# Altium PCB OFP_MCM_v1.5.PcbDoc (part 1 of 8)
Units mm, origin at the board's own origin, x right, y up, seen from the top; angles counter-clockwise.
Board outline 110 x 120 mm, 4 copper layers (Top Layer, Layer 1, Layer 2, Bottom Layer), stack 1.576 mm thick; 353 components, 268 nets, 1240 pads, 519 vias.
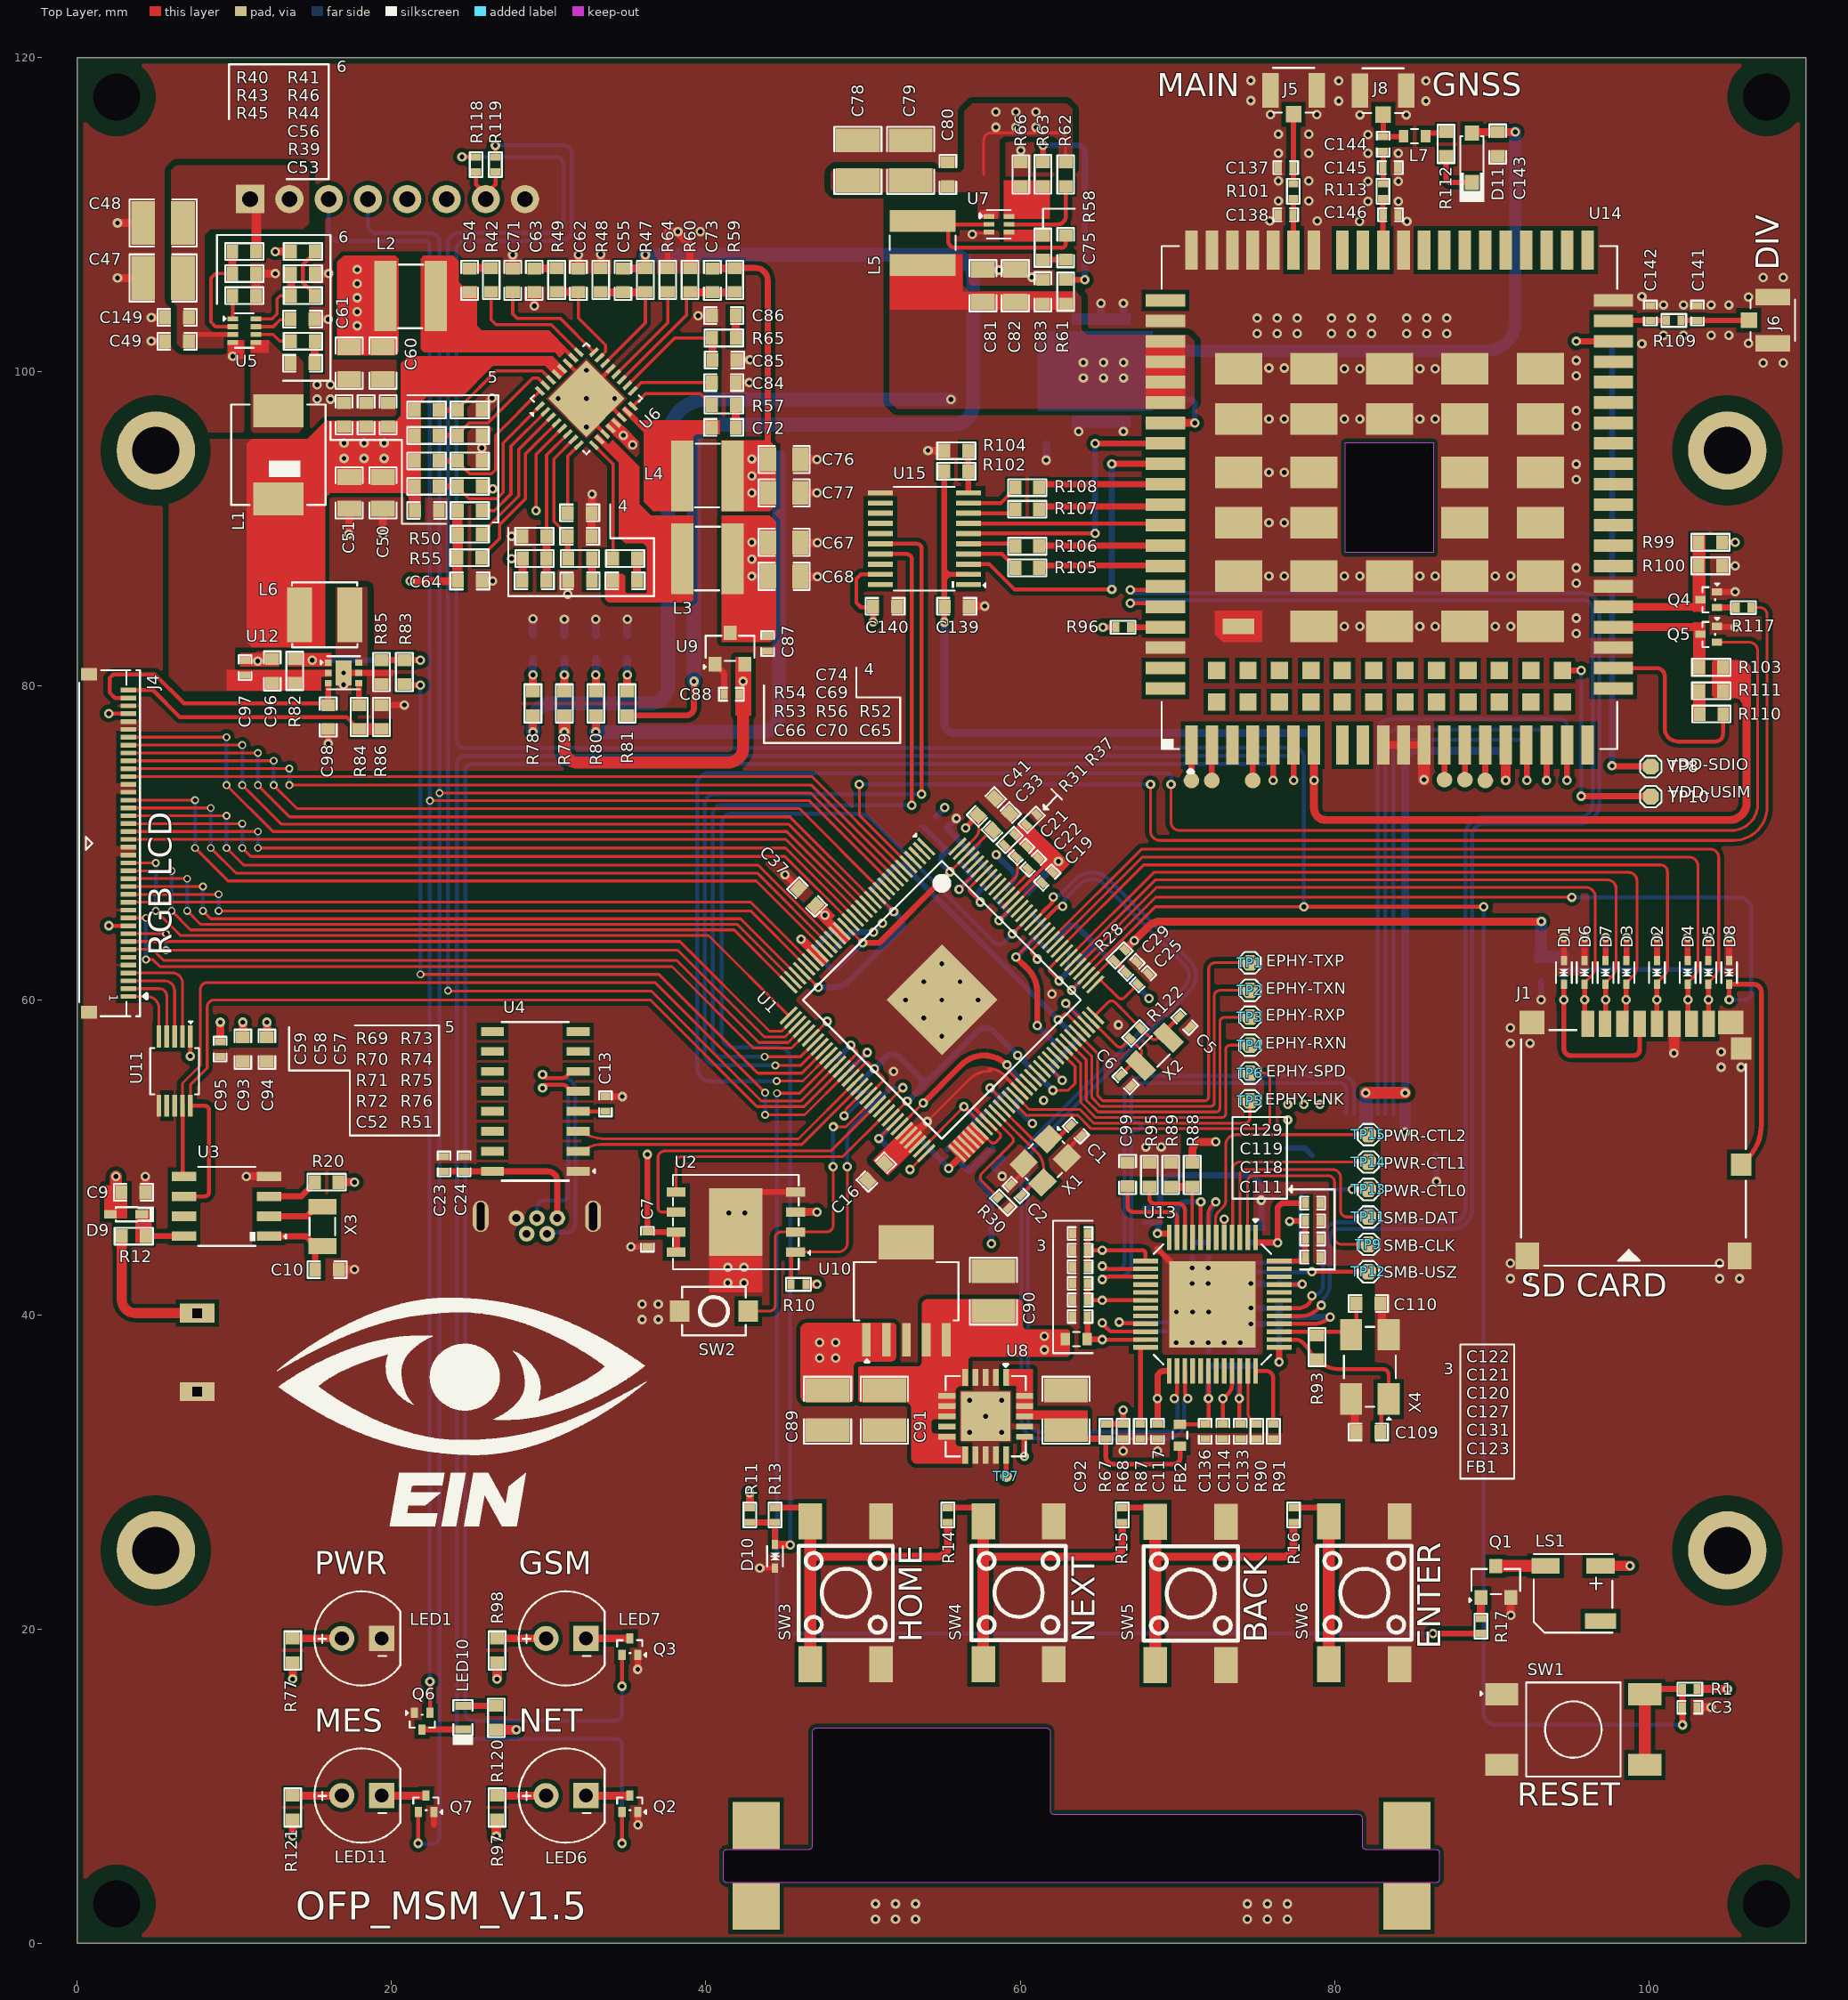
[diagram p0: Top Layer view]
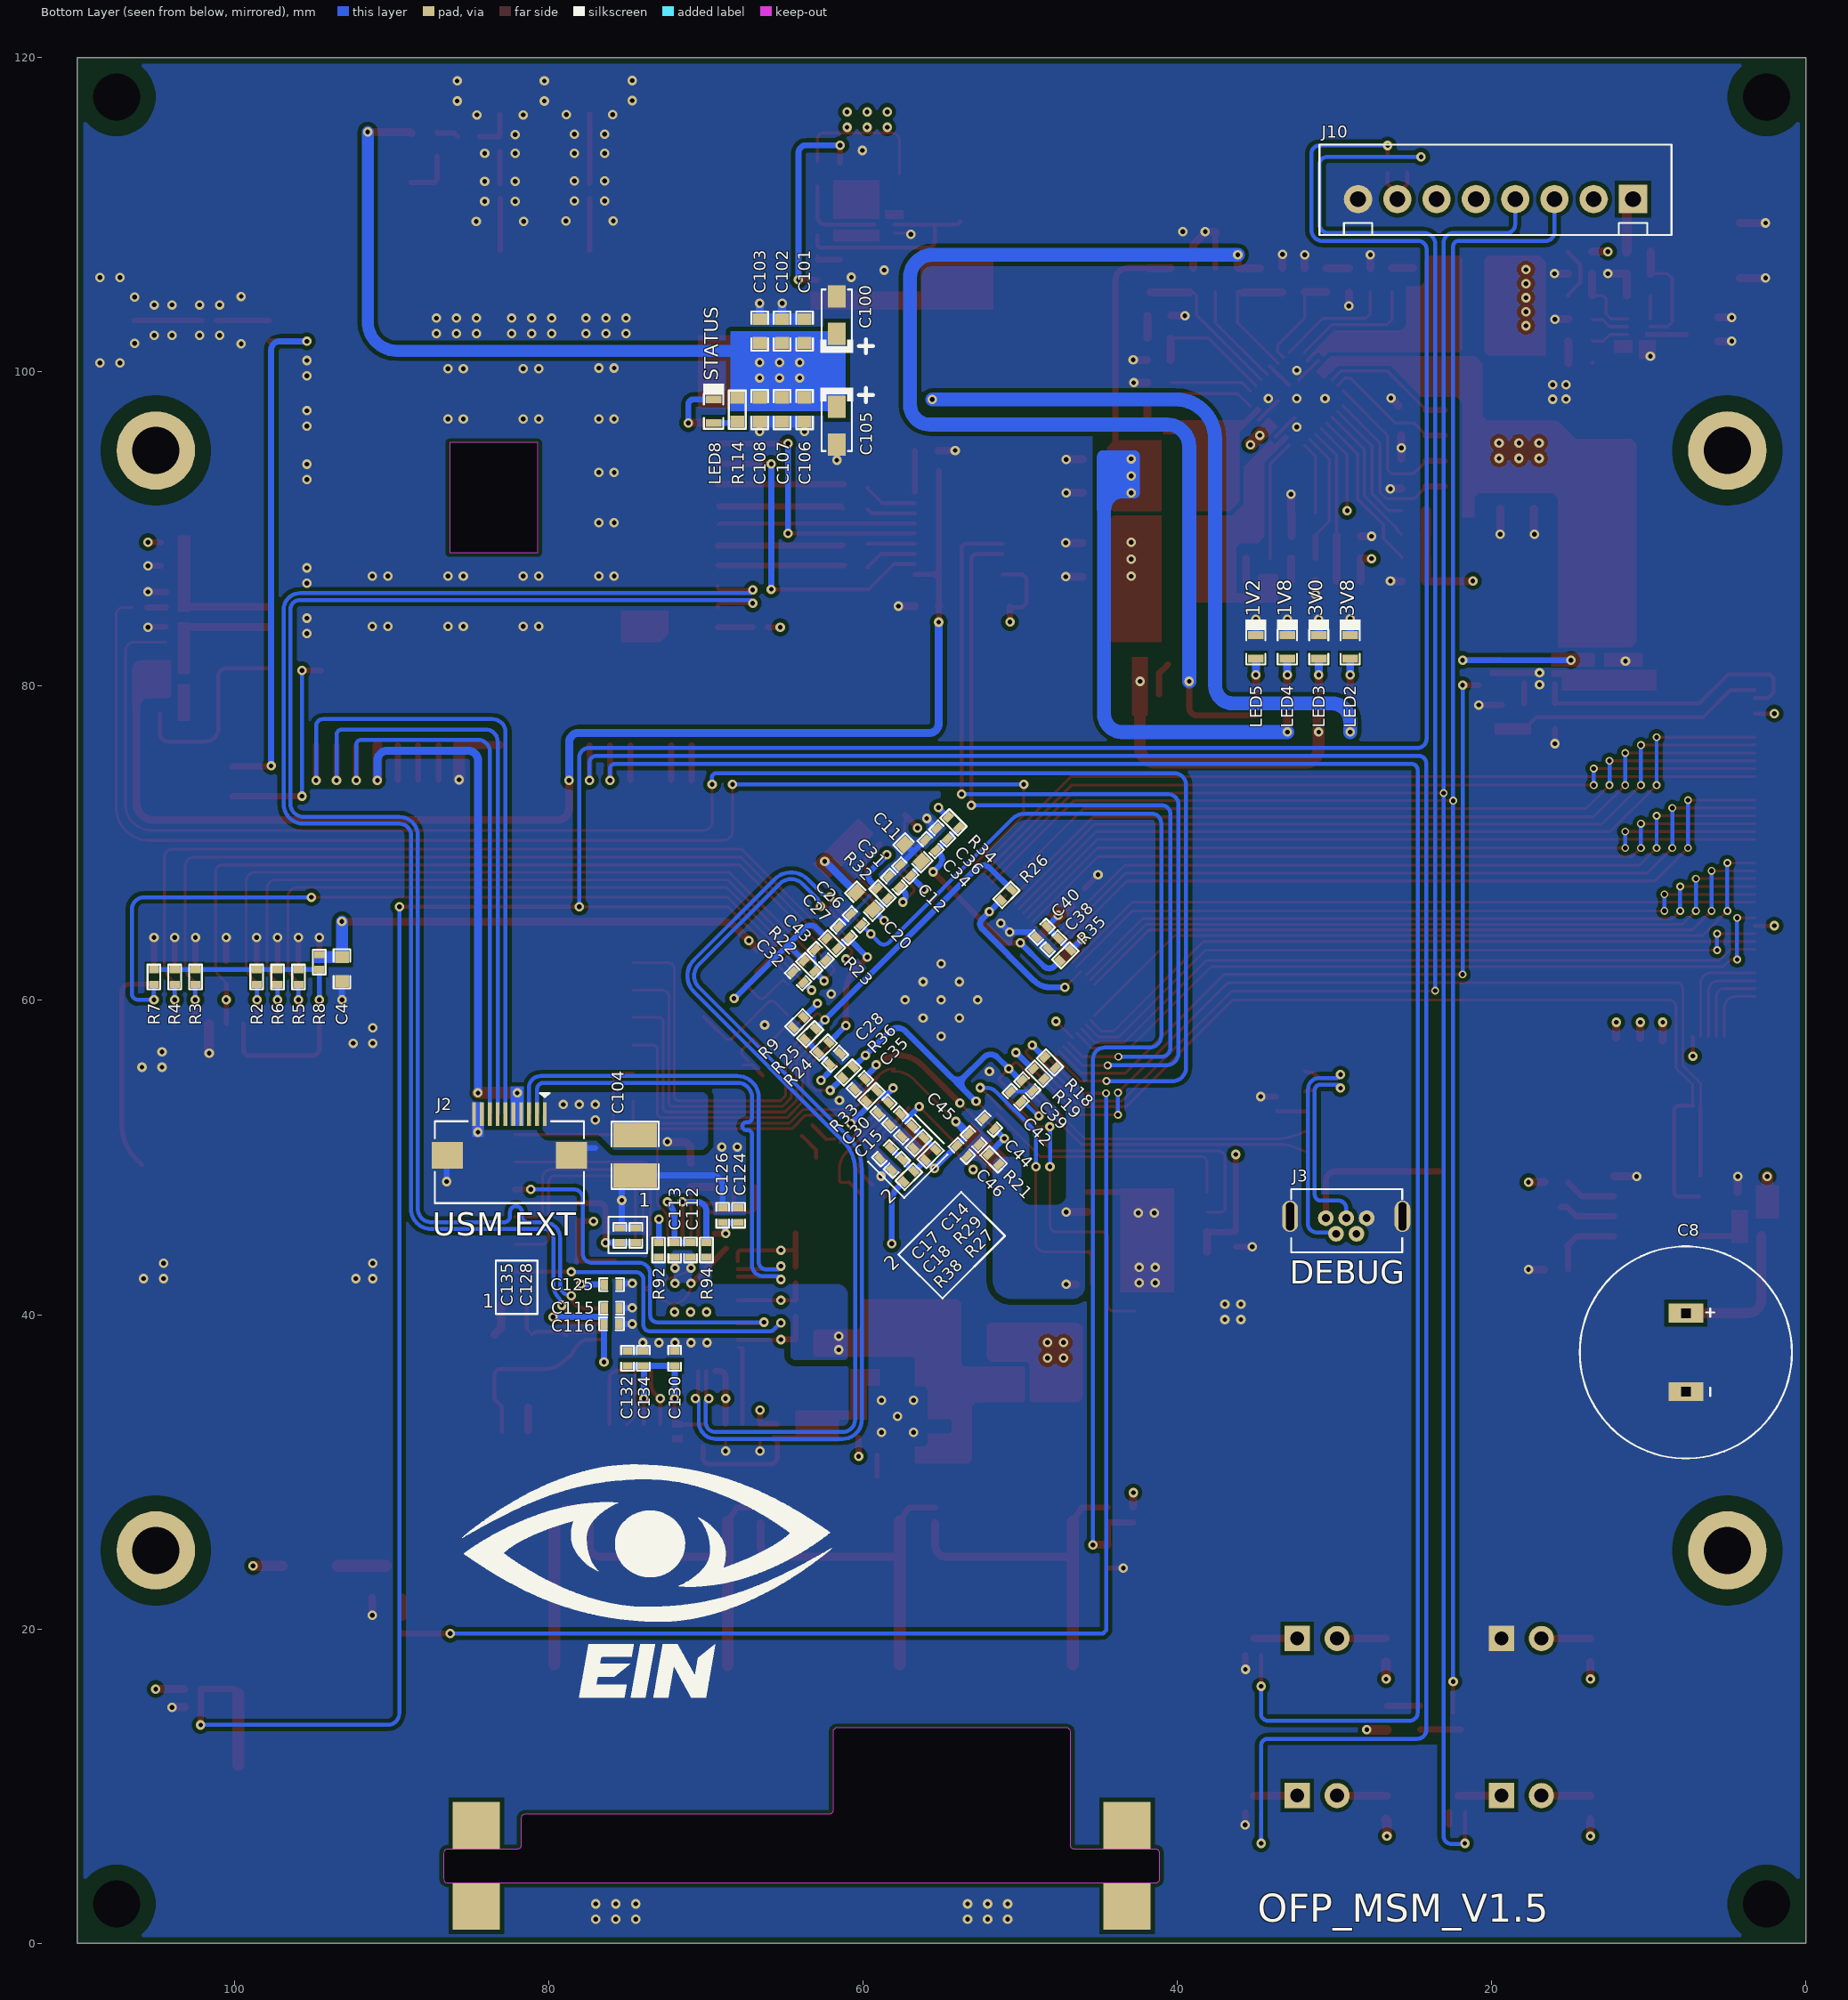
[diagram p1: Bottom Layer view, seen from below]
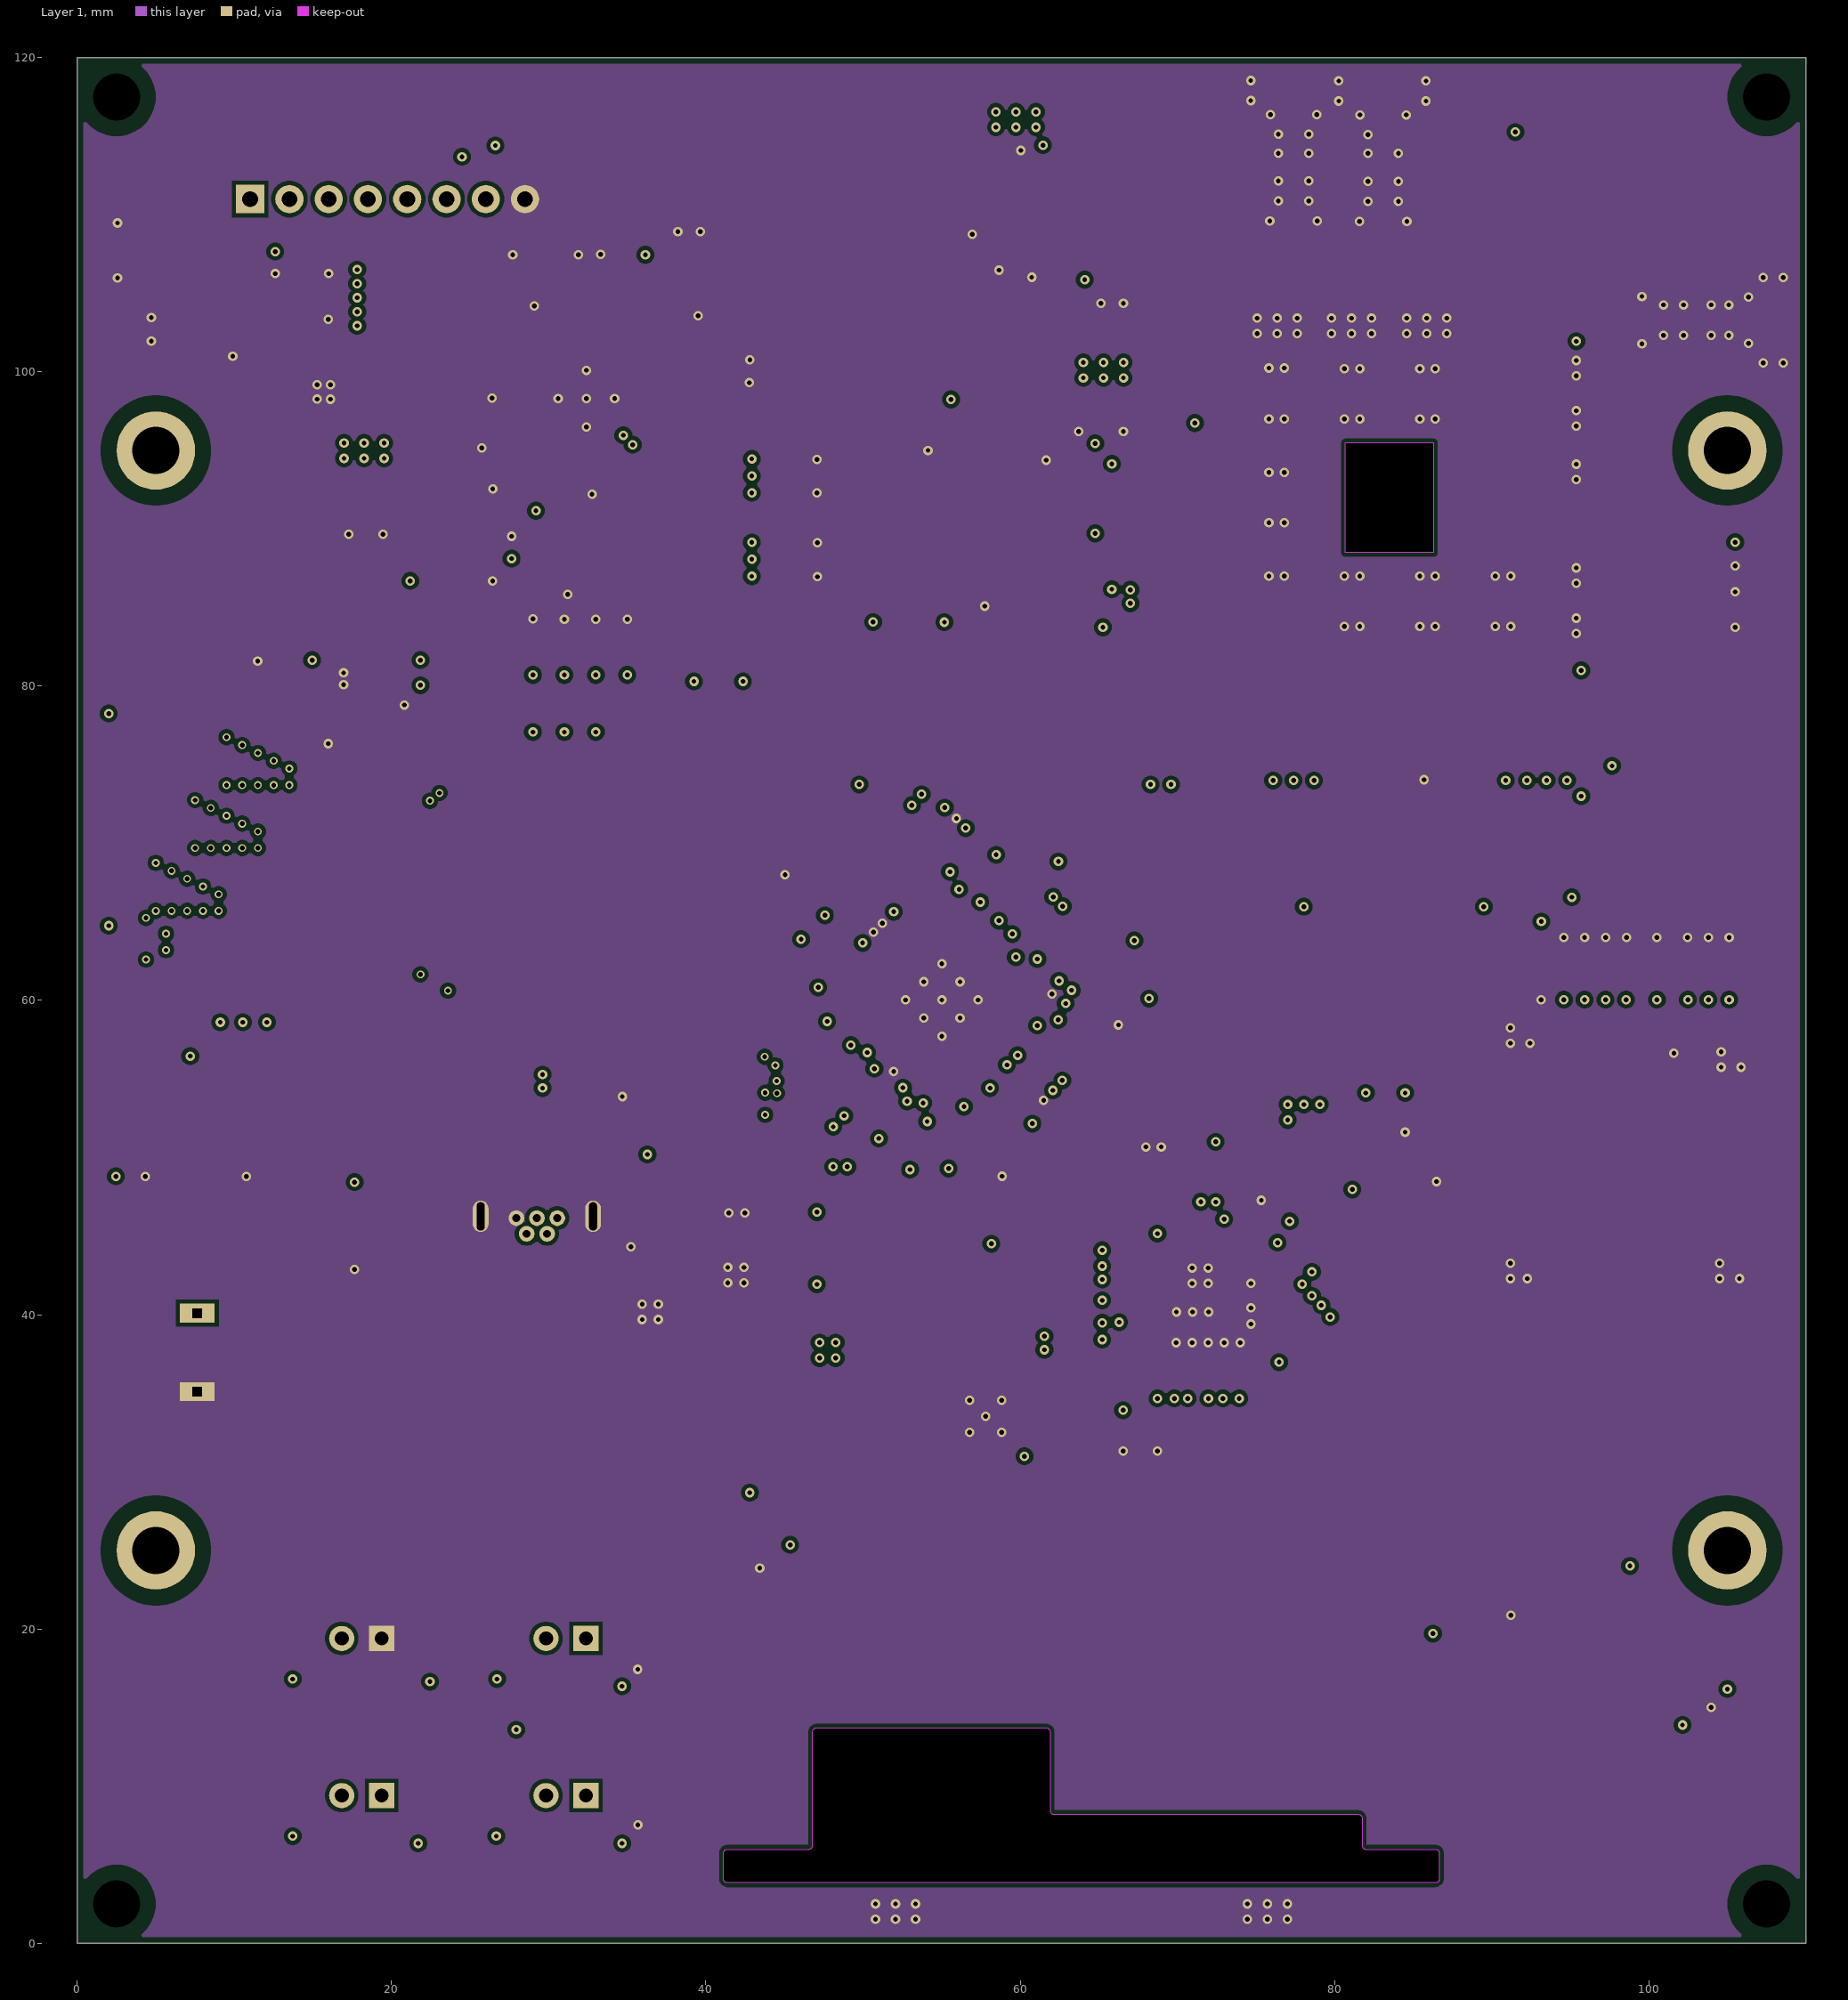
[diagram p2: Layer 1]
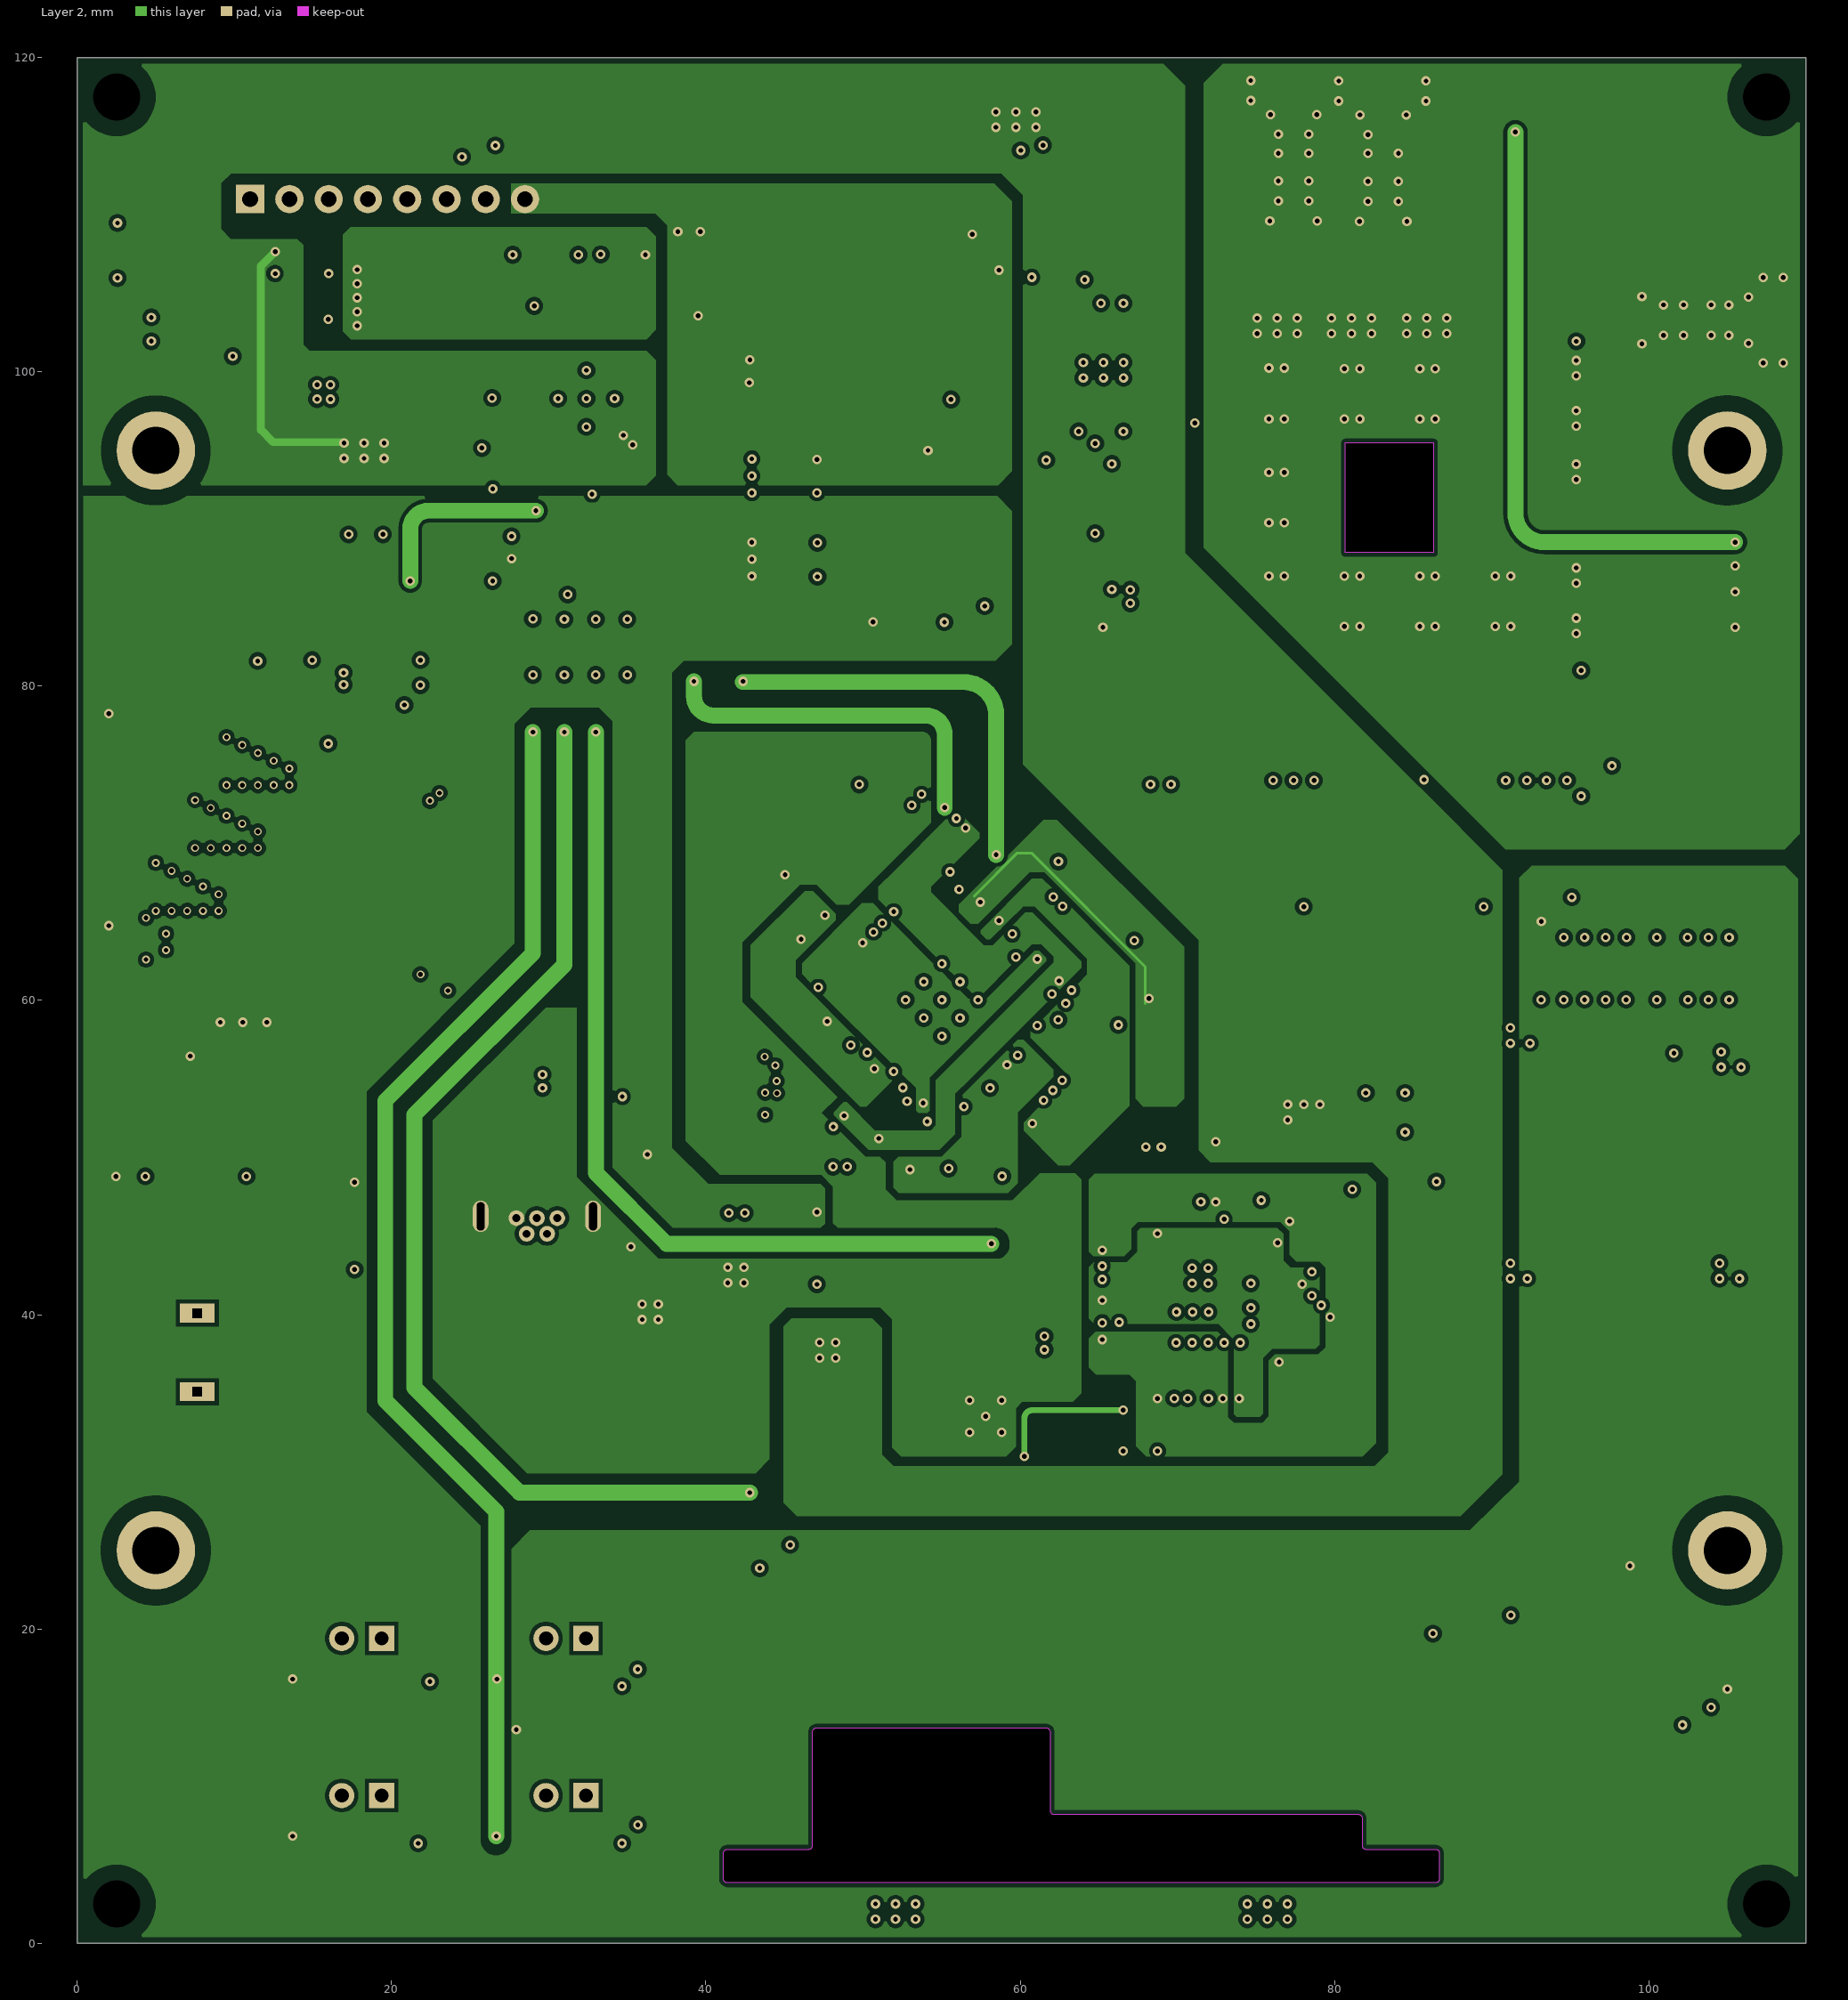
[diagram p3: Layer 2]
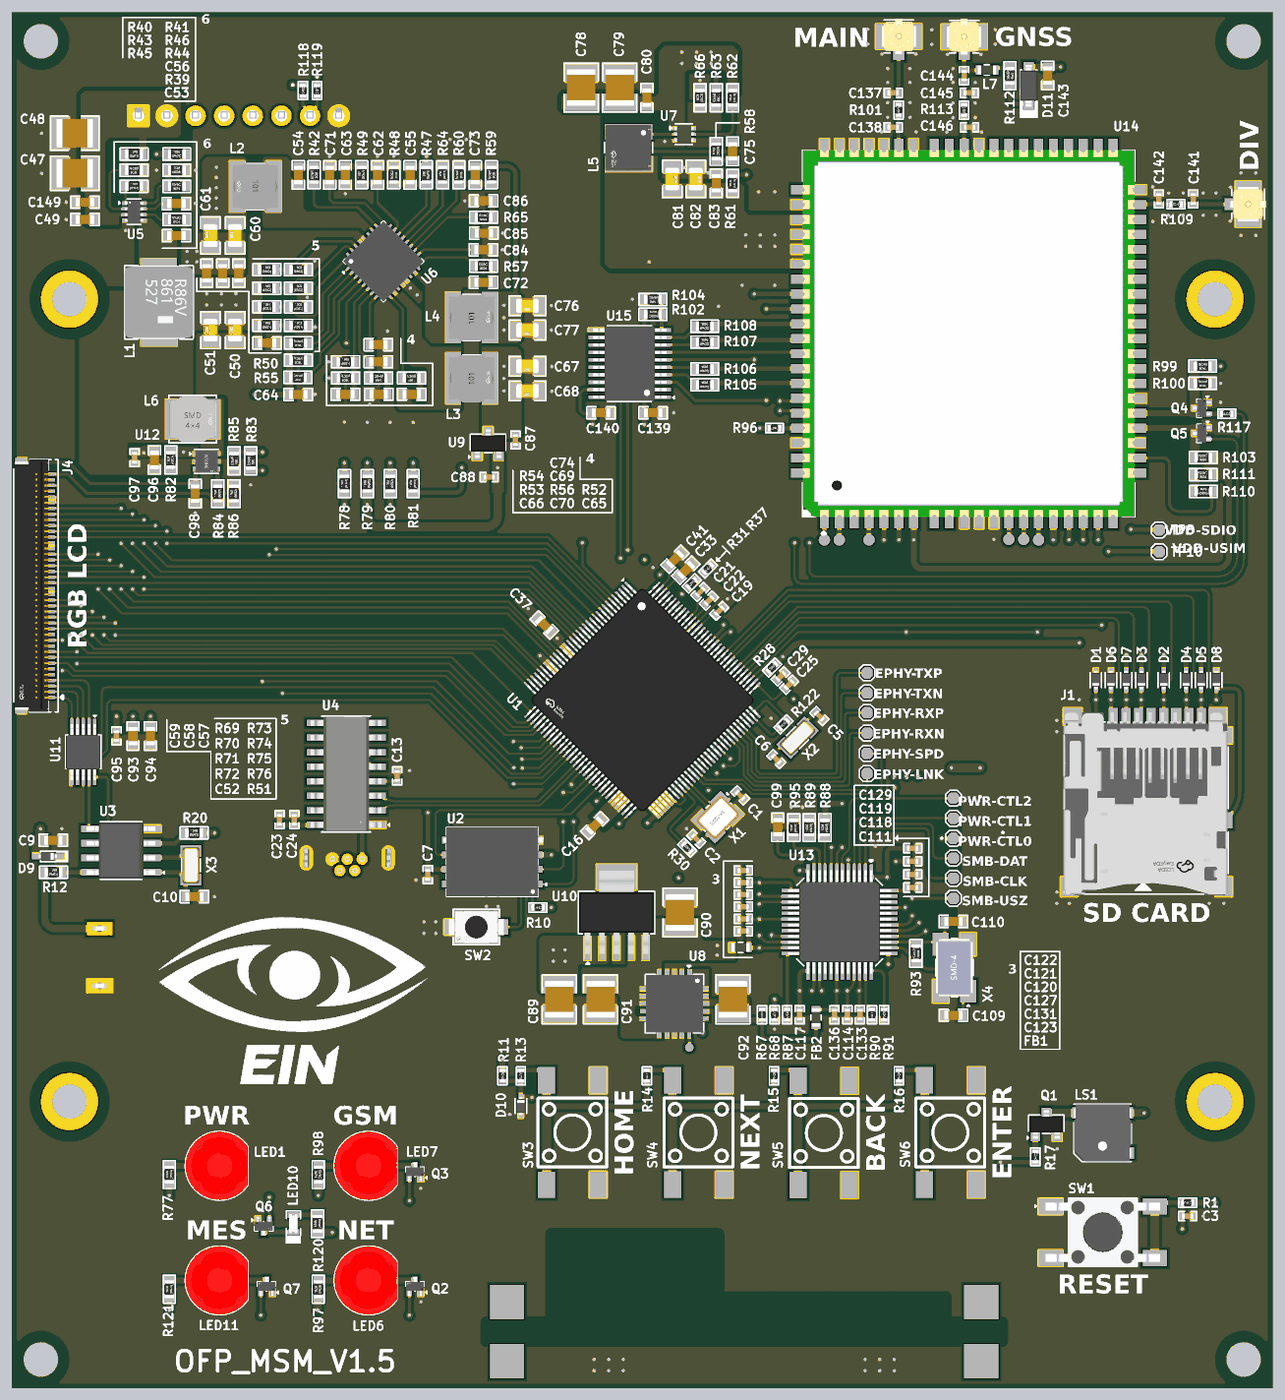
[diagram p7: 3D render of the assembled board from above, using the file's embedded part models]
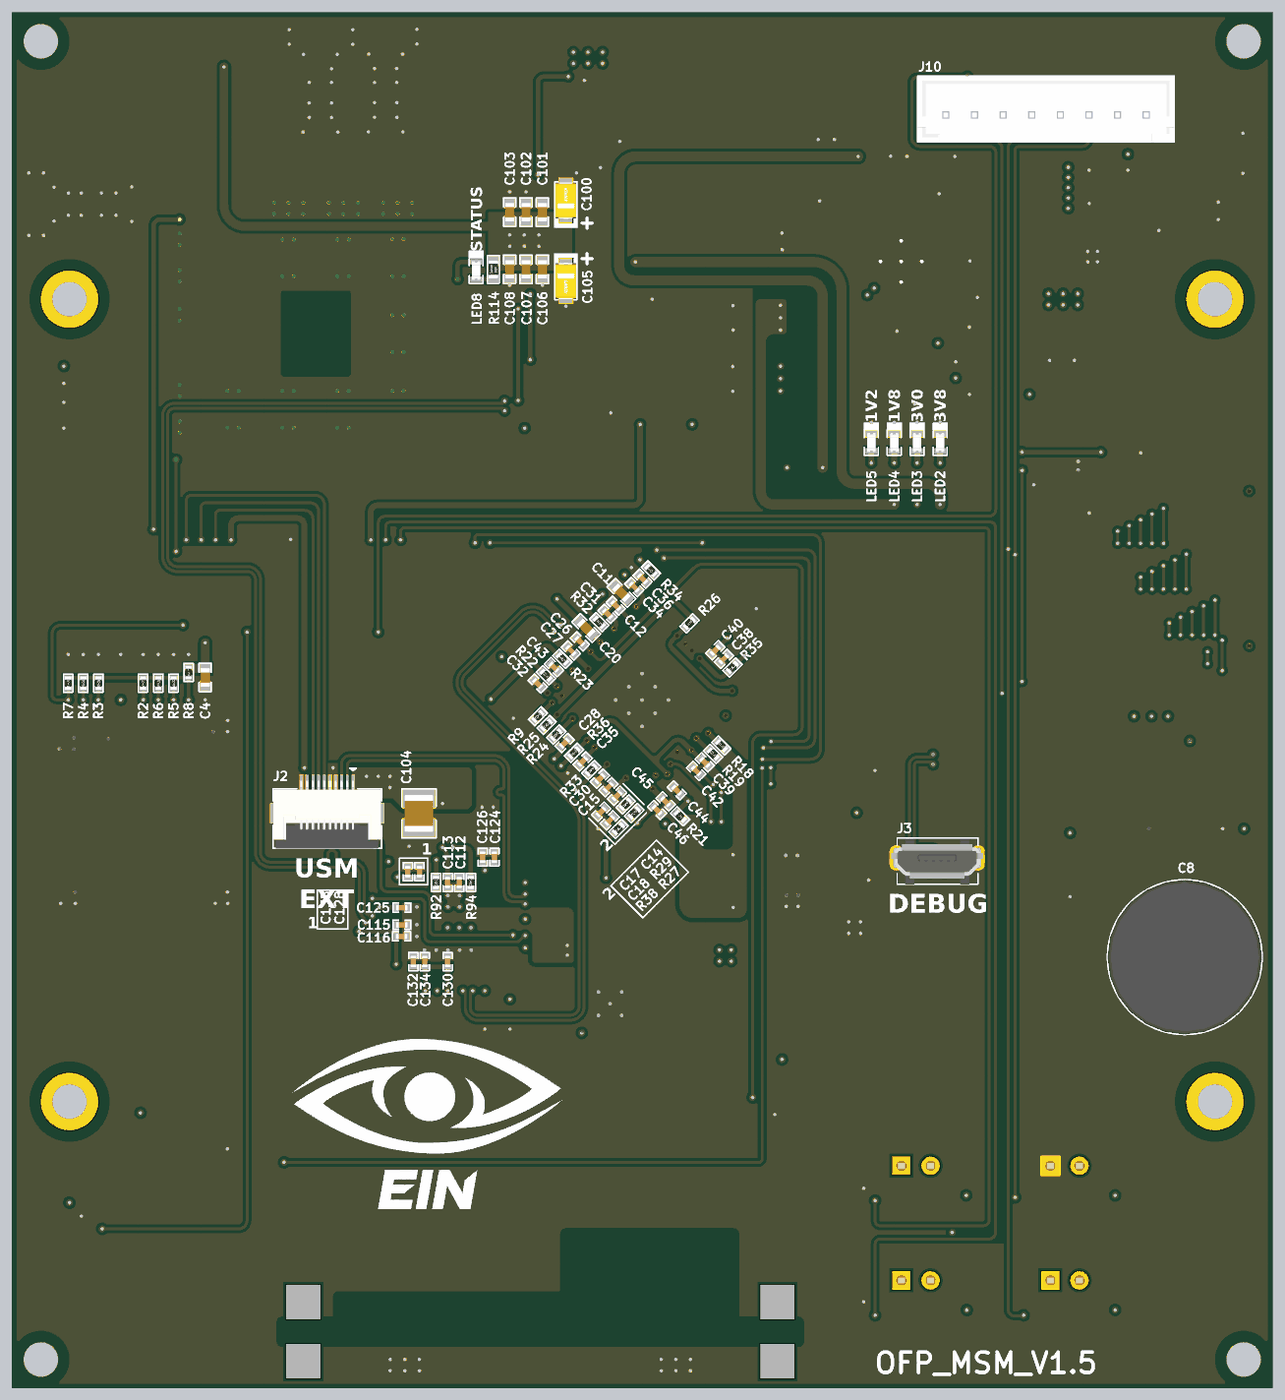
[diagram p8: 3D render of the assembled board from below, using the file's embedded part models]

## Layer stack, top to bottom
Top Solder: solder mask 0.0102, Solder Resist, Dk 3.5
Top Layer: signal copper 0.035
Dielectric 2: prepreg 0.203, PP-006, Dk 4.4
Layer 1: signal copper 0.035
Dielectric 1: dielectric 1.03, FR-4, Dk 4.6
Layer 2: signal copper 0.035
Dielectric 3: prepreg 0.203, PP-006, Dk 4.4
Bottom Layer: signal copper 0.035
Bottom Solder: solder mask 0.0102, Solder Resist, Dk 3.5

## Board outline
0,0 0,120 110,120 110,0
cut-out: 41.38,3.841 cw(c41.38,4.1) 41.121,4.1 41.121,5.73 cw(c41.38,5.73) 41.38,5.989 46.559,5.989 ccw(c46.559,6.221) 46.791,6.221 46.791,13.45 cw(c47.05,13.45) 47.05,13.709 61.65,13.709 cw(c61.65,13.45) 61.909,13.45 61.909,8.454 ccw(c62.154,8.454) 62.154,8.209 81.5,8.209 cw(c81.5,7.95) 81.759,7.95 81.759,6.218 ccw(c81.988,6.218) 81.988,5.989 86.42,5.989 cw(c86.42,5.73) 86.679,5.73 86.679,4.1 cw(c86.42,4.1) 86.42,3.841
cut-out: 80.7,88.5 80.7,95.5 86.3,95.5 86.3,88.5

## Design rules (kind name [scope] priority, off if disabled: settings)
BoardOutlineClearance [All] p1: gap=0 ignorepadtopadclearanceinfootprint=FALSE except(0.381: Poly-OutlineEdge)
Clearance [All] p1: gap=0.254 ignorepadtopadclearanceinfootprint=FALSE except(0.152: Arc-Via Track-Via SMDPad-SMDPad; 0.178: Arc-Arc Arc-Track Arc-SMDPad Arc-THPad Arc-Fill Arc-Region Track-Track Track-SMDPad Track-THPad Track-Fill Track-Region SMDPad-Via SMDPad-Fill SMDPad-Region THPad-THPad THPad-Region Via-Fill Via-Region Fill-Fill Fill-Region Region-Region; 0.381: Poly-Poly)
ComponentClearance [All] p1: gap=0 collisioncheckmode=3 verticalgap=0 showdistances=FALSE
DiffPairsRouting [InDifferentialPairClass('DIFF_USB')] p1: maxlimit=0.254 minlimit=0.178 mostfreqgap=0.254 toplayer_maxgap=0.178 toplayer_prefgap=0.178 toplayer_minwidth=0.254 toplayer_maxwidth=0.254 toplayer_prefwidth=0.254 midlayer1_mingap=0.254 midlayer1_minwidth=0.178 midlayer1_maxwidth=0.178 midlayer1_prefwidth=0.178 midlayer2_mingap=0.254 midlayer2_minwidth=0.178 midlayer2_maxwidth=0.178 midlayer2_prefwidth=0.178 bottomlayer_maxgap=0.178 bottomlayer_prefgap=0.178 bottomlayer_minwidth=0.254 bottomlayer_maxwidth=0.254 bottomlayer_prefwidth=0.254 impedanceprofiledriven=TRUE impedanceprofileid={ABD523BC-F643-4530-ABE1-0D8876D3E9E7} impedanceprofilevalue=90.000000 maxuncoupledlength=12.7
HoleSize [All] p1: absolutevalues=TRUE maxlimit=25.4 minlimit=0.025 maxpercent=80.000 minpercent=20.000
HoleToHoleClearance [All] p1: gap=0 allowstackedmicrovias=TRUE
MinimumSolderMaskSliver [All] p1: minsoldermaskwidth=0
PolygonConnect [All] p1: connectstyle=Direct reliefconductorwidth=0.254 reliefentries=4 polygonreliefangle="90 Angle" airgapwidth=0.254
RoutingVias [All] p1: holewidth=0.3 width=0.6 viastyle="Through Hole" minholewidth=0.2 minwidth=0.4 maxholewidth=0.7 maxwidth=1.2
ShortCircuit "ShortCircuit - No NET" [InNet('No Net')] p1: allowed=TRUE
SilkToSilkClearance [All] p1: silktosilkclearance=0
SilkToSolderMaskClearance [IsPad] p1: minsilkscreentomaskgap=0 clearancetoexposedcopper=TRUE
SolderMaskExpansion [All] p1: expansion=0.102 istentingtop=FALSE
SupplyNets "Schematic Supply Nets_51" [InNet('VCC-DRAM')] p1: voltage=0.000
SupplyNets "Schematic Supply Nets_50" [InNet('+EXT')] p2: voltage=0.000
SupplyNets "Schematic Supply Nets_49" [InNet('VCC-RTC')] p3: voltage=0.000
SupplyNets "Schematic Supply Nets_48" [InNet('VDD11')] p4: voltage=0.000
SupplyNets "Schematic Supply Nets_47" [InNet('VCC-USB')] p5: voltage=0.000
SupplyNets "Schematic Supply Nets_40" [InNet('+1.8V')] p6: voltage=0.000
SupplyNets "Schematic Supply Nets_39" [InNet('VRA1')] p7: voltage=0.000
SupplyNets "Schematic Supply Nets_38" [InNet('VLED+')] p8: voltage=0.000
SupplyNets "Schematic Supply Nets_37" [InNet('+5VUSB')] p9: voltage=0.000
SupplyNets "Schematic Supply Nets_36" [InNet('VDD33')] p10: voltage=0.000
SupplyNets "Schematic Supply Nets_35" [InNet('VLED-')] p11: voltage=0.000
SupplyNets "Schematic Supply Nets_34" [InNet('VCC-MCSI')] p12: voltage=0.000
SupplyNets "Schematic Supply Nets_32" [InNet('V7V')] p13: voltage=0.000
SupplyNets "Schematic Supply Nets_31" [InNet('AVCC')] p14: voltage=0.000
SupplyNets "Schematic Supply Nets_30" [InNet('3.3V-HUB')] p15: voltage=0.000
SupplyNets "Schematic Supply Nets_28" [InNet('VDD-SYS')] p16: voltage=0.000
SupplyNets "Schematic Supply Nets_27" [InNet('AGND')] p17: voltage=0.000
SupplyNets "Schematic Supply Nets_26" [InNet('RTC_VIO')] p18: voltage=0.000
SupplyNets "Schematic Supply Nets_25" [InNet('VSD')] p19: voltage=0.000
SupplyNets "Schematic Supply Nets_22" [InNet('VCC_PE')] p20: voltage=0.000
SupplyNets "Schematic Supply Nets_21" [InNet('+3.0V')] p21: voltage=0.000
SupplyNets "Schematic Supply Nets_20" [InNet('VDD-PHY')] p22: voltage=0.000
SupplyNets "Schematic Supply Nets_18" [InNet('+3.8V')] p23: voltage=0.000
SupplyNets "Schematic Supply Nets_17" [InNet('+USIM')] p24: voltage=0.000
SupplyNets "Schematic Supply Nets_16" [InNet('SVREF')] p25: voltage=0.000
SupplyNets "Schematic Supply Nets_15" [InNet('CH_3.3V')] p26: voltage=0.000
SupplyNets "Schematic Supply Nets_14" [InNet('VCC-HP')] p27: voltage=0.000
SupplyNets "Schematic Supply Nets_13" [InNet('V3S_RST')] p28: voltage=0.000
SupplyNets "Schematic Supply Nets_12" [InNet('HPVCCBP')] p29: voltage=0.000
SupplyNets "Schematic Supply Nets_11" [InNet('+1.2V')] p30: voltage=0.000
SupplyNets "Schematic Supply Nets_10" [InNet('VCC-PLL')] p31: voltage=0.000
SupplyNets "Schematic Supply Nets_9" [InNet('+3.3V')] p32: voltage=0.000
SupplyNets "Schematic Supply Nets_8" [InNet('VRA2')] p33: voltage=0.000
SupplyNets "Schematic Supply Nets_6" [InNet('1.1V-HUB')] p34: voltage=0.000
SupplyNets "Schematic Supply Nets_5" [InNet('VDD-CPU')] p35: voltage=0.000
SupplyNets "Schematic Supply Nets_3" [InNet('VCC-PHY')] p36: voltage=0.000
SupplyNets "Schematic Supply Nets_2" [InNet('KEYADC0')] p37: voltage=0.000
SupplyNets "Schematic Supply Nets" [InNet('VCC-IO')] p38: voltage=0.000
SupplyNets "Schematic Supply Nets_45" [InNet('GND')] p39: voltage=0.000
SupplyNets "Schematic Supply Nets_42" [InNet('+5V')] p40: voltage=0.000
SupplyNets "Schematic Supply Nets_41" [InNet('VIN+')] p41: voltage=0.000
Width [All] p1: maxlimit=2.54 minlimit=0.178 preferedwidth=0.381 minimp=50.000000 maximp=50.000000 favimp=50.000000
22 further rules are at their usual default settings.

## Classes and differential pairs
differential pair class DIFF_USB: CH_USB USB-D USB-GSM-D USB-PD-D
component class RGB-LCD-Sheet: C93 C94 C95 C96 C97 C98 J4 L6 R82 R83 R84 R85 R86 U11 U12
component class Others-Sheet: C149 J10 LED10 LED11 Q6 Q7 R117 R118 R119 R120 R121
component class Microprocessor-Sheet: C1 C2 C3 C4 C5 C6 C7 C8 C9 C10 C11 C12 C13 C14 C15 C16 C17 C18 C19 C20 C21 C22 C23 C24 C25 C26 C27 C28 C29 C30 C31 C32 C33 C34 C35 C36 C37 C38 C39 C40 C41 C42 C43 C44 C45 C46 D1 D2 D3 D4 D5 D6 D7 D8 D9 D10 J1 J2 J3 LS1 Q1 R1 R2 R3 R4 R5 R6 R7 R8 R9 R10 R11 R12 R13 R14 R15 R16 R17 R18 R19 R20 R21 R22 R23 R24 R25 R26 R27 R28 R29 R30 R31 R32 R33 R34 R35 R36 R37 R38 R122 SW1 SW2 SW3 SW4 SW5 SW6 TP1 TP2 TP3 TP4 TP5 TP6 U1 U2 U3 U4 X1 X2 X3
component class GSM-USB-HUB-Sheet: C99 C100 C101 C102 C103 C104 C105 C106 C107 C108 C109 C110 C111 C112 C113 C114 C115 C116 C117 C118 C119 C120 C121 C122 C123 C124 C125 C126 C127 C128 C129 C130 C131 C132 C133 C134 C135 C136 C137 C138 C139 C140 C141 C142 C143 C144 C145 C146 D11 FB1 FB2 J5 J6 J8 L7 LED6 LED7 LED8 Q2 Q3 Q4 Q5 R87 R88 R89 R90 R91 R92 R93 R94 R95 R96 R97 R98 R99 R100 R101 R102 R103 R104 R105 R106 R107 R108 R109 R110 R111 R112 R113 R114 TP8 TP9 TP10 TP11 TP12 TP13 TP14 TP15 U13 U14 U15 X4
component class Power-Sheet: C47 C48 C49 C50 C51 C52 C53 C54 C55 C56 C57 C58 C59 C60 C61 C62 C63 C64 C65 C66 C67 C68 C69 C70 C71 C72 C73 C74 C75 C76 C77 C78 C79 C80 C81 C82 C83 C84 C85 C86 C87 C88 C89 C90 C91 C92 L1 L2 L3 L4 L5 LED1 LED2 LED3 LED4 LED5 R39 R40 R41 R42 R43 R44 R45 R46 R47 R48 R49 R50 R51 R52 R53 R54 R55 R56 R57 R58 R59 R60 R61 R62 R63 R64 R65 R66 R67 R68 R69 R70 R71 R72 R73 R74 R75 R76 R77 R78 R79 R80 R81 TP7 U5 U6 U7 U8 U9 U10
differential pair CH_USB: +CH_USB_P -CH_USB_N
differential pair USB-PD-D: +USB-PD-D_P -USB-PD-D_N
differential pair USB-GSM-D: +USB-GSM-D_P -USB-GSM-D_N
differential pair USB-D: +USB-D_P -USB-D_N

## Components (designator, comment, footprint, x,y, rotation, side; value= is the part's Value field where it differs from the comment)
C1 "15pF" Cap-0402 63.55,51.72 r135 top
C2 "15pF" Cap-0402 59.718,47.926 r315 top
C3 "1uF" Cap-0402 102.616,15.015 r180 top
C4 "10uF" Cap-0603 93.157,62.007 r90 bottom
C5 "15pF" Cap-0402 70.461,58.638 r135 top
C6 "15pF" Cap-0402 66.708,54.889 r135 top
C7 "0.1uF" Cap-0402 36.279,44.795 r90 top value=100nF
C8 "0.47F" "SC EB 5R5 474 M" 7.64,37.6 r270 bottom
C9 "0.1uF" Cap-0603 3.575,47.793 r180 top value=100nF
C10 "12pF" Cap-0603 15.9,42.875 r180 top
C11 "10uF" Cap-0603 56.817,69.392 r225 bottom
C12 "0.1uF" Cap-0402 57.311,68.263 r225 bottom value=100nF
C13 "0.1uF" Cap-0402 33.608,53.414 r270 top value=100nF
C14 "0.1uF" Cap-0402 57.2,51.675 r135 bottom value=100nF
C15 "0.1uF" Cap-0402 57.951,52.425 r135 bottom value=100nF
C16 "10uF" Cap-0603 50.848,49.073 r45 top
C17 "1uF" Cap-0402 58.59,50.281 r135 bottom
C18 "0.1uF" Cap-0402 57.835,49.537 r135 bottom value=100nF
C19 "0.1uF" Cap-0402 61.728,67.827 r225 top value=100nF
C20 "10uF" Cap-0603 59.891,66.318 r225 bottom
C21 "4.7uF" Cap-0402 60.083,69.469 r225 top
C22 "1uF" Cap-0402 60.829,68.712 r225 top
C23 "1uF" Cap-0402 23.341,49.594 r270 top
C24 "0.1uF" Cap-0402 24.621,49.594 r270 top value=100nF
C25 "4.7uF" Cap-0402 67.824,61.365 r225 top
C26 "1nF" Cap-0402 60.452,65.148 r225 bottom
C27 "0.1uF" Cap-0402 61.224,64.351 r225 bottom value=100nF
C28 "0.1uF" Cap-0402 61.779,56.279 r315 bottom value=100nF
C29 "0.1uF" Cap-0402 67.086,62.109 r225 top value=100nF
C30 "0.1uF" Cap-0402 58.695,53.17 r135 bottom value=100nF
C31 "0.1uF" Cap-0402 58.024,67.551 r225 bottom value=100nF
C32 "10nF" Cap-0402 64.125,61.475 r225 bottom
C33 "10uF" Cap-0603 58.805,71.367 r225 top
C34 "1uF" Cap-0402 55.688,69.886 r225 bottom
C35 "0.1uF" Cap-0402 60.197,54.671 r135 bottom value=100nF
C36 "0.1uF" Cap-0402 54.963,70.612 r225 bottom value=100nF
C37 "10uF" Cap-0603 46.437,66.584 r315 top
C38 "1uF" Cap-0402 47.876,63.621 r135 bottom
C39 "0.1uF" Cap-0402 49.541,54.578 r45 bottom value=100nF
C40 "0.1uF" Cap-0402 48.627,64.371 r135 bottom value=100nF
C41 "10uF" Cap-0603 57.853,72.319 r225 top
C42 "1uF" Cap-0402 50.29,53.854 r225 bottom
C43 "0.1uF" Cap-0402 62.7,62.9 r45 bottom value=100nF
C44 "0.1uF" Cap-0402 51.975,52.152 r225 bottom value=100nF
C45 "1uF" Cap-0402 52.951,51.175 r45 bottom
C46 "0.1uF" Cap-0402 53.702,50.424 r45 bottom value=100nF
C47 "10uF" Cap-1210 5.464,105.978 r0 top
C48 "10uF" Cap-1210 5.464,109.478 r0 top
C49 "0.1uF" Cap-0603 6.353,101.952 r0 top value=100nF
C50 "22uF" Cap-0805 19.451,92.3 r90 top
C51 "22uF" Cap-0805 17.308,92.3 r90 top
C52 "0.1uF" Cap-0603 22.251,91.175 r180 top value=100nF
C53 "0.1uF" Cap-0603 14.338,100.552 r180 top value=100nF
C54 "47nF" Cap-0603 24.976,105.825 r270 top
C55 "82pF" Cap-0603 34.732,105.825 r270 top
C56 "33nF" Cap-0603 14.338,103.352 r180 top
C57 "10uF" Cap-0603 19.781,97.271 r270 top
C58 "10uF" Cap-0603 18.381,97.271 r270 top
C59 "0.1uF" Cap-0603 16.978,97.271 r270 top value=100nF
C60 "22uF" Cap-0805 19.453,100.557 r90 top
C61 "22uF" Cap-0805 17.305,100.557 r90 top
C62 "22pF" Cap-0603 31.891,105.825 r90 top
C63 "3.3nF" Cap-0603 29.083,105.825 r270 top
C64 "1uF" Cap-0603 24.978,86.692 r180 top
C65 "47nF" Cap-0603 34.865,86.705 r180 top
C66 "22pF" Cap-0603 29.092,86.705 r0 top
C67 "22uF" Cap-0805 44.983,89.154 r180 top
C68 "22uF" Cap-0805 44.983,86.995 r180 top
C69 "22pF" Cap-0603 31.975,89.541 r0 top
C70 "2.2nF" Cap-0603 31.992,86.705 r180 top
C71 "0.01uF" Cap-0603 27.714,105.825 r270 top
C72 "47nF" Cap-0603 41.146,96.473 r180 top
C73 "22pF" Cap-0603 40.416,105.825 r270 top
C74 "0.01uF" Cap-0603 31.975,91.034 r180 top
C75 "0.1uF" Cap-0603 62.897,107.902 r90 top value=100nF
C76 "22uF" Cap-0805 44.983,94.431 r180 top
C77 "22uF" Cap-0805 44.983,92.304 r180 top
C78 "10uF" Cap-1210 49.675,113.46 r270 top
C79 "10uF" Cap-1210 53.029,113.46 r270 top
C80 "0.1uF" Cap-0603 55.402,112.571 r270 top value=100nF
C81 "22uF" Cap-0805 57.629,105.487 r270 top
C82 "22uF" Cap-0805 59.683,105.487 r270 top
C83 "0.1uF" Cap-0603 61.456,105.106 r270 top value=100nF
C84 "0.01uF" Cap-0603 41.146,99.315 r180 top
C85 "22pF" Cap-0603 41.177,100.766 r0 top
C86 "2.2nF" Cap-0603 41.146,103.577 r180 top
C87 "1uF" Cap-0402 43.932,82.711 r90 top
C88 "1uF" Cap-0402 41.632,79.484 r0 top
C89 "10uF" Cap-1210 47.752,33.924 r90 top
C90 "10uF" Cap-1210 58.304,41.504 r270 top
C91 "10uF" Cap-1210 51.359,33.924 r90 top
C92 "10uF" Cap-1210 62.916,33.924 r270 top
C93 "10uF" Cap-0603 10.541,56.896 r90 top
C94 "10uF" Cap-0603 12.068,56.896 r90 top
C95 "0.1uF" Cap-0402 9.1,56.9 r90 top value=100nF
C96 "2.2uF" Cap-0603 12.411,80.976 r270 top
C97 "0.1uF" Cap-0402 10.683,81.175 r270 top value=100nF
C98 "1uF" Cap-0603 15.975,78.039 r90 top
C99 "1uF" Cap-0603 66.84,48.926 r270 top
C100 "100uF" Case-A 61.664,103.616 r90 bottom
C101 "0.1uF" Cap-0603 63.719,102.6 r270 bottom value=100nF
C102 "33pF" Cap-0603 65.146,102.6 r270 bottom
C103 "10pF" Cap-0603 66.573,102.6 r270 bottom
C104 "10uF" Cap-1210 74.498,50.142 r90 bottom
C105 "100uF" Case-A 61.664,96.584 r270 bottom
C106 "0.1uF" Cap-0603 63.719,97.6 r90 bottom value=100nF
C107 "33pF" Cap-0603 65.146,97.6 r90 bottom
C108 "10pF" Cap-0603 66.573,97.6 r90 bottom
C109 "30pF" Cap-0603 82.167,32.532 r0 top
C110 "30pF" Cap-0603 82.167,40.711 r180 top
C111 "0.1uF" Cap-0402 78.613,43.671 r180 top value=100nF
C112 "10nF" Cap-0402 70.975,44.117 r90 bottom
C113 "1nF" Cap-0402 71.989,44.117 r90 bottom
C114 "0.1uF" Cap-0402 72.904,32.578 r90 top value=100nF
C115 "10nF" Cap-0402 75.987,40.417 r0 bottom
C116 "1nF" Cap-0402 76.007,39.417 r0 bottom
C117 "0.1uF" Cap-0402 68.746,32.578 r90 top value=100nF
C118 "10nF" Cap-0402 78.613,44.821 r180 top
C119 "1nF" Cap-0402 78.613,45.967 r180 top
C120 "0.1uF" Cap-0402 63.819,43.05 r0 top value=100nF
C121 "10nF" Cap-0402 63.819,44.106 r0 top
C122 "1nF" Cap-0402 63.819,45.162 r0 top
C123 "1uF" Cap-0402 63.819,39.882 r0 top
C124 "0.1uF" Cap-0402 67.912,46.328 r270 bottom value=100nF
C125 "10nF" Cap-0402 75.987,41.917 r0 bottom
C126 "1nF" Cap-0402 68.926,46.328 r270 bottom
C127 "0.1uF" Cap-0402 63.819,41.994 r0 top value=100nF
C128 "10nF" Cap-0402 74.451,45.056 r270 bottom
C129 "1nF" Cap-0402 78.613,47.101 r180 top
C130 "0.1uF" Cap-0402 71.982,37.217 r270 bottom value=100nF
C131 "10nF" Cap-0402 63.819,40.938 r0 top
C132 "1nF" Cap-0402 74.982,37.217 r270 bottom
C133 "0.1uF" Cap-0402 74.005,32.578 r90 top value=100nF
C134 "10nF" Cap-0402 73.982,37.217 r270 bottom
C135 "1nF" Cap-0402 75.465,45.056 r270 bottom
C136 "10uF" Cap-0402 71.779,32.578 r90 top
C137 "DNP" Cap-0402 76.9,113 r0 top
C138 "DNP" Cap-0402 76.9,110 r0 top
C139 "0.1uF" Cap-0603 55.959,85.084 r180 top value=100nF
C140 "0.1uF" Cap-0603 51.41,85.084 r180 top value=100nF
C141 "DNP" Cap-0402 103.096,103.749 r270 top
C142 "DNP" Cap-0402 100.104,103.749 r270 top
C143 "DNP" Cap-0603 90.399,114.503 r90 top value=100nF
C144 "DNP" Cap-0402 83.1,114.5 r90 top
C145 "DNP" Cap-0402 83.549,113 r180 top
C146 "DNP" Cap-0402 83.575,109.996 r180 top
C149 "10uF" Cap-0603 6.353,103.464 r0 top
D1 "ESD5Z3.3C" "SOD-523 (Bi-Directional)" 94.598,61.774 r270 top
D2 "ESD5Z3.3C" "SOD-523 (Bi-Directional)" 100.522,61.774 r270 top
D3 "ESD5Z3.3C" "SOD-523 (Bi-Directional)" 98.582,61.774 r270 top
D4 "ESD5Z3.3C" "SOD-523 (Bi-Directional)" 102.476,61.774 r270 top
D5 "ESD5Z3.3C" "SOD-523 (Bi-Directional)" 103.796,61.774 r270 top
D6 "ESD5Z3.3C" "SOD-523 (Bi-Directional)" 95.917,61.774 r270 top
D7 "ESD5Z3.3C" "SOD-523 (Bi-Directional)" 97.25,61.774 r270 top
D8 "ESD5Z3.3C" "SOD-523 (Bi-Directional)" 105.117,61.774 r270 top
D9 "1N4148WT" SOD-523F 3.105,46.393 r0 top
D10 "ESD5Z3.3C" "SOD-523 (Bi-Directional)" 44.4,24.62 r90 top
D11 "DNP" SOD-123 88.74,113.631 r270 top
FB1 "BLM18PG221SN1D" "IND-0603 (1608 Metric)" 63.568,38.45 r0 top value=100mR
FB2 "BLM18PG221SN1D" "IND-0603 (1608 Metric)" 70.172,32.327 r90 top value=100mR
J1 "5027740891" 5027740891 99.075,51.17 r0 top locked
J2 "HX0.5-10P XJH2.0 043" "HX0.5-10P XJH2.0 043" 82.499,51.458 r180 bottom locked
J3 "U-D-M5DD-Y-3" U-D-M5DD-Y-3 29.248,45.704 r180 bottom
J4 "FH34SRJ-40S-0.5SH(50)" FH34SRJ-40S-0.5SH(50) 2,70 r270 top locked
J5 "U.FL-R-SMT(10)" U.FL-R-SMT(10) 77.4,117.163 r90 top
J6 "U.FL-R-SMT(10)" U.FL-R-SMT(10) 107.129,103.292 r0 top
J8 "DNP" U.FL-R-SMT(10) 83.1,117.138 r90 top
J10 "B8B-XH-A(LF)(SN)" B8B-XH-A(LF)(SN) 19.75,111 r0 bottom locked
L1 "6.8uH" ETQP3M6R8KVN 12.8,94.73 r270 top value=45.6mR
L2 "4.7uH" SMNR4030-4R7MT 21.218,104.833 r180 top
L3 "4.7uH" SMNR4030-4R7MT 40.1,88.104 r0 top
L4 "4.7uH" SMNR4030-4R7MT 40.1,93.384 r0 top
L5 "4.7uH" SRN4018-4R7M 53.799,108.206 r270 top
L6 "22uH" YNR4018-220M 15.75,84.541 r0 top
L7 "DNP" "IND-0603 (1608 Metric)" 85.1,115 r180 top value=47nH
LED1 "RED" "TH LED 5mm_" 18.1,19.4 r180 top
LED2 "RED" LED-0603 29,82.5 r90 bottom
LED3 "RED" LED-0603 31,82.5 r90 bottom
LED4 "RED" LED-0603 33,82.5 r90 bottom
LED5 "RED" LED-0603 35,82.5 r90 bottom
LED6 "GREEN" "TH LED 5mm Green" 31.1,9.4 r180 top
LED7 "YELLOW" "TH LED 5mm Yellow" 31.1,19.4 r180 top
LED8 "RED" LED-0603 69.507,97.498 r90 bottom
LED10 "Yellow" LED-0603 24.546,14.361 r270 top
LED11 "GREEN" "TH LED 5mm Green" 18.1,9.4 r180 top
LS1 "FUET-5025" FUET-5025 95.182,22.265 r180 top
Q1 "MMBT2222A-7-F" SOT-23 90.272,23.006 r0 top
Q2 "DTC143ZETL" SOT-416 35.166,8.875 r0 top
Q3 "DTC143ZETL" SOT-416 35.166,18.875 r0 top
Q4 "DTC143ZETL" SOT-416 103.824,85.503 r90 top
Q5 "DTC143ZETL" SOT-416 103.824,83.303 r90 top
Q6 "DTC143ZETL" SOT-416 21.946,14.133 r180 top
Q7 "DTC143ZETL" SOT-416 22.2,8.875 r0 top
R1 "47K" Res-0402 102.616,16.18 r0 top
R2 "47K" Res-0402 98.582,61.499 r90 bottom
R3 "47K" Res-0402 102.477,61.499 r90 bottom
R4 "47K" Res-0402 103.797,61.499 r90 bottom
R5 "47K" Res-0402 95.917,61.499 r90 bottom
R6 "47K" Res-0402 97.25,61.499 r90 bottom
R7 "47K" Res-0402 105.118,61.499 r90 bottom
R8 "3.3R" Res-0402 94.598,62.439 r90 bottom
R9 "5.6K" Res-0402 64.108,58.608 r315 bottom value=5.6kR
R10 "10K" Res-0402 45.896,41.935 r0 top
R11 "11K" Res-0402 42.8,27.253 r90 top value=11kR
R12 "120R" Res-0603 3.6,45 r180 top
R13 "6.8K" Res-0402 44.4,27.253 r90 top value=6.8kR
R14 "8.2K" Res-0402 55.4,27.253 r90 top value=8.2kR
R15 "10K" Res-0402 66.5,27.253 r90 top
R16 "100K" Res-0402 77.4,27.253 r90 top
R17 "1K" Res-0402 89.322,20.192 r90 top
R18 "4.7K" Res-0402 48.094,56.051 r45 bottom
R19 "4.7K" Res-0402 48.817,55.327 r45 bottom
R20 "5.1K" Res-0603 15.875,48.438 r180 top
R21 "0R" Res-0402 51.687,49.888 r45 bottom
R22 "0R" Res-0402 63.413,62.192 r45 bottom
R23 "0R" Res-0402 61.975,63.625 r225 bottom
R24 "0R" Res-0402 62.505,57.005 r315 bottom
R25 "0R" Res-0402 63.357,57.857 r135 bottom
R26 "0R" Res-0402 50.876,66.721 r315 bottom
R27 "2K" Res-0402 55.698,50.173 r315 bottom value=2kR
R28 "0R" Res-0402 66.33,62.87 r225 top
R29 "2K" Res-0402 56.449,50.924 r135 bottom value=2kR
R30 "240R" Res-0402 58.932,47.135 r135 top
R31 "200K" Res-0402 59.333,70.212 r225 top value=200kR
R32 "0R" Res-0402 58.762,66.813 r225 bottom
R33 "0R" Res-0402 59.446,53.921 r135 bottom
R34 "0R" Res-0402 54.237,71.337 r225 bottom
R35 "0R" Res-0402 47.125,62.87 r135 bottom
R36 "0R" Res-0402 60.947,55.422 r315 bottom
R37 "0R" Res-0402 60.731,71.501 r45 top
R38 "0R" Res-0402 57.08,48.793 r135 bottom
R39 "0R" Res-0603 14.363,101.952 r0 top
R40 "511K" Res-0603 10.633,107.654 r180 top value=511kR
R41 "49.9R" Res-0603 14.363,107.654 r180 top
R42 "0R" Res-0603 26.345,105.851 r90 top
R43 "88.7K" Res-0603 10.633,106.254 r0 top value=88.7kR
R44 "10.2K" Res-0603 14.363,104.854 r0 top
R45 "0R" Res-0603 10.633,104.854 r180 top
R46 "53.6K" Res-0603 14.363,106.254 r180 top value=53.6kR
R47 "10K" Res-0603 36.153,105.851 r270 top
R48 "10K" Res-0603 33.312,105.851 r90 top
R49 "20K" Res-0603 30.504,105.851 r270 top
R50 "100K" Res-0603 24.978,89.675 r0 top value=100kR
R51 "100K" Res-0603 24.978,91.175 r0 top value=100kR
R52 "0R" Res-0603 34.865,88.124 r0 top
R53 "45.3k" Res-0603 29.102,88.124 r0 top
R54 "10K" Res-0603 29.092,89.541 r180 top
R55 "0R" Res-0603 24.952,88.175 r0 top
R56 "30K" Res-0603 31.992,88.124 r0 top
R57 "0R" Res-0603 41.146,97.894 r0 top
R58 "0R" Res-0603 61.456,107.901 r270 top
R59 "20K" Res-0603 41.836,105.851 r90 top
R60 "10K" Res-0603 38.995,105.851 r90 top
R61 "51R" Res-0603 62.897,105.106 r270 top
R62 "20K" Res-0603 62.897,112.571 r270 top
R63 "10K" Res-0603 61.456,112.571 r90 top
R64 "73.2K" Res-0603 37.574,105.851 r270 top value=73.2kR
R65 "30K" Res-0603 41.146,102.156 r0 top
R66 "37.4K" Res-0603 60.046,112.571 r270 top
R67 "1.87K" Res-0402 65.459,32.578 r270 top
R68 "4.99K" Res-0402 66.552,32.578 r90 top value=4.99kR
R69 "140K" Res-0603 22.225,97.574 r180 top
R70 "100K" Res-0603 22.225,95.955 r180 top value=100kR
R71 "100K" Res-0603 22.225,94.336 r180 top value=100kR
R72 "100K" Res-0603 22.225,92.717 r180 top value=100kR
R73 "20K" Res-0603 24.978,97.574 r180 top
R74 "51K" Res-0603 24.978,95.955 r180 top value=51kR
R75 "51K" Res-0603 24.978,94.336 r180 top value=51kR
R76 "51K" Res-0603 24.978,92.717 r180 top value=51kR
R77 "680R" Res-0603 13.716,18.638 r270 top
R78 "820R" Res-0603 29,78.9 r270 top
R79 "499R" Res-0603 31,78.9 r270 top
R80 "100R" Res-0603 33,78.9 r270 top
R81 "10R" Res-0603 35,78.9 r270 top
R82 "0R" Res-0603 13.843,80.975 r270 top
R83 "DNP" Res-0603 20.816,80.9 r90 top
R84 "0R" Res-0603 17.941,78.039 r270 top
R85 "DNP" Res-0603 19.369,80.9 r90 top
R86 "10R" Res-0603 19.357,78.039 r270 top
R87 "9.53K" Res-0402 67.64,32.578 r90 top value=9.53kR
R88 "90.9K" Res-0603 70.947,48.901 r270 top
R89 "10K" Res-0603 69.581,48.901 r270 top
R90 "4.7K" Res-0402 75.056,32.578 r90 top
R91 "4.7K" Res-0402 76.113,32.578 r90 top
R92 "4.7K" Res-0402 73.002,44.117 r270 bottom
R93 "1M" Res-0603 78.895,37.932 r90 top
R94 "4.7K" Res-0402 69.962,44.117 r270 bottom
R95 "1K" Res-0603 68.224,48.901 r270 top
R96 "0R" Res-0402 66.548,83.75 r180 top
R97 "680R" Res-0603 26.716,8.638 r270 top
R98 "680R" Res-0603 26.716,18.638 r270 top
R99 "DNP" Res-0603 103.924,89.157 r0 top
R100 "10K" Res-0603 103.924,87.657 r0 top
R101 "0R" Res-0402 77.383,111.5 r270 top
R102 "47K" Res-0603 55.934,93.684 r180 top value=47kR
R103 "DNP" Res-0603 103.976,81.2 r0 top
R104 "0R" Res-0603 55.934,94.984 r0 top
R105 "22R" Res-0603 60.452,87.529 r180 top
R106 "22R" Res-0603 60.452,88.904 r180 top
R107 "22R" Res-0603 60.452,91.258 r180 top
R108 "22R" Res-0603 60.452,92.634 r180 top
R109 "0R" Res-0402 101.6,103.275 r180 top
R110 "DNP" Res-0603 103.988,78.232 r180 top
R111 "4.7K" Res-0603 103.976,79.7 r0 top
R112 "DNP" Res-0603 87.1,114.5 r90 top
R113 "DNP" Res-0402 83.092,111.5 r270 top
R114 "680R" Res-0603 68,97.6 r90 bottom
R117 "0R" Res-0402 106.024,85.003 r0 top
R118 "0R" Res-0402 25.38,113.2 r90 top
R119 "DNP" Res-0402 26.61,113.2 r90 top
R120 "680R" Res-0603 26.67,14.349 r270 top
R121 "680R" Res-0603 13.716,8.638 r270 top
R122 "10M" Res-0402 67.333,57.909 r225 top
SW1 "FSM6JSMATR" FSM6JSMATR 95.2,13.6 r0 top locked
SW2 "TS-1088-AR02016" TS-1088-AR02016 40.515,40.227 r180 top locked
SW3 "TS-1002S-12026C" TS-1002S-12026C 48.9,22.3 r270 top locked
SW4 "TS-1002S-12026C" TS-1002S-12026C 59.9,22.3 r270 top locked
SW5 "TS-1002S-12026C" TS-1002S-12026C 70.858,22.26 r270 top locked
SW6 "TS-1002S-12026C" TS-1002S-12026C 81.9,22.302 r270 top locked
TP1 "TEST POINT 0.5mm Dia" "Test-point - 0.5mm"#1 74.627,62.399 r90 top
TP2 "TEST POINT 0.5mm Dia" "Test-point - 0.5mm"#1 74.627,60.644 r90 top
TP3 "TEST POINT 0.5mm Dia" "Test-point - 0.5mm"#1 74.627,58.93 r90 top
TP4 "TEST POINT 0.5mm Dia" "Test-point - 0.5mm"#1 74.627,57.152 r90 top
TP5 "TEST POINT 0.5mm Dia" "Test-point - 0.5mm"#1 74.627,53.614 r90 top
TP6 "TEST POINT 0.5mm Dia" "Test-point - 0.5mm"#1 74.627,55.374 r90 top
TP7 "TEST POINT 0.5mm Dia" "Test-point - 0.5mm"#2 59.108,29.718 r0 top
TP8 "TEST POINT 0.5mm Dia" "Test-point - 0.5mm"#1 100.128,74.875 r90 top
TP9 "TEST POINT 0.5mm Dia" "Test-point - 0.5mm"#1 82.161,44.478 r270 top
TP10 "TEST POINT 0.5mm Dia" "Test-point - 0.5mm"#1 100.128,72.97 r90 top
TP11 "TEST POINT 0.5mm Dia" "Test-point - 0.5mm"#1 82.161,46.224 r270 top
TP12 "TEST POINT 0.5mm Dia" "Test-point - 0.5mm"#1 82.161,42.731 r270 top
TP13 "TEST POINT 0.5mm Dia" "Test-point - 0.5mm"#1 82.161,47.971 r270 top
TP14 "TEST POINT 0.5mm Dia" "Test-point - 0.5mm"#1 82.161,49.718 r270 top
TP15 "TEST POINT 0.5mm Dia" "Test-point - 0.5mm"#1 82.161,51.464 r270 top
U1 "V3s" LQFP-128-EP(14x14) 55.02,60.034 r315 top locked
U2 "W25Q128JVEIQ" WSON-8-EP(6x8) 41.915,45.9 r180 top locked
U3 "PCF8563T/5,518" "SOIC-8(0.154\", 3.90mm Width)" 9.5,46.9 r180 top
U4 "CH340C" SOP-16 29.148,53.579 r180 top locked
U5 "TPS62933DRLR" SOT-583 10.633,102.631 r0 top
U6 "TPS65261RHBR" "32-QFN (5x5)" 32.4,98.3 r45 top
U7 "TPS563202DRLR" SOT-563 58.649,109.391 r0 top
U8 "TPS74801RGWR" "20-VQFN (5x5)" 57.808,33.539 r270 top
U9 "XC6206P302MR-G" SOT-23 41.542,82.401 r0 top
U10 "TPS7A4533DCQR" SOT-223-6_ 52.756,41.504 r0 top
U11 "NS2009" 10-MSOP 6.2,55.5 r270 top
U12 "TPS61158DRVR" WSON-6-EP(2x2) 16.95,80.85 r0 top
U13 "TUSB4020BIPHPR" "48-HTQFP (7x7)" 72.232,40.667 r270 top locked
U14 "EC21EFA-512-STD" EC21EFA-512-STD 83.5,92 r90 top locked
U15 "TXS0108EPWR" TSSOP-20 53.91,89.384 r180 top
X1 "24MHz" SMD3225-4P 61.6,49.8 r225 top
X2 "32.768kHz" SMD3215-2P 68.553,56.746 r225 top
X3 "32.768kHz" SMD3215-2P 15.6,45.615 r90 top
X4 "24MHz" SMD5032-4P 82.251,36.681 r90 top

## Footprints (in the part's own frame and the unit in brackets; to place one, negate y for a bottom-side part, rotate by r counter-clockwise, add the part's x,y. Pads: shape width x height; smd on the part's side, far side on the other; paste and mask are expansions set on the pad)
10-MSOP [mm]
  rect 1.4x0.3 smd: 1(-2.2,1) 2(-2.2,0.5) 3(-2.2,0) 4(-2.2,-0.5) 5(-2.2,-1) 6(2.2,-1) 7(2.2,-0.5) 8(2.2,0) 9(2.2,0.5) 10(2.2,1)
  silkscreen extent -3.18,-1.55 1.47,1.55, body extent -2.45,-1.5 2.45,1.5, height 1.07
"20-VQFN (5x5)" [mm]
  rect 1.087x0.364 smd paste-100 mask+0.051: 1(-2.468,1.3) 2(-2.469,0.65) 3(-2.469,0) 4(-2.468,-0.65) 5(-2.469,-1.3) 11(2.468,-1.3) 12(2.468,-0.65) 13(2.468,0) 14(2.468,0.65) 15(2.468,1.3)
  rect 0.364x1.087 smd paste-100 mask+0.051: 6(-1.3,-2.468) 7(-0.65,-2.468) 8(0,-2.468) 9(0.65,-2.468) 10(1.3,-2.469) 16(1.3,2.468) 17(0.65,2.468) 18(0,2.468) 19(-0.65,2.468) 20(-1.3,2.468)
  rect 3.15x3.15 smd paste-100 mask+0.051: 21(0,0)
  silkscreen extent -3.31,-2.55 2.55,2.55, body extent -2.5,-2.5 2.5,2.5, height 1
"32-QFN (5x5)" [mm]
  rect 0.7x0.25 smd: 1(-2.435,1.75) 2(-2.435,1.25) 3(-2.435,0.75) 4(-2.435,0.25) 5(-2.435,-0.25) 6(-2.435,-0.75) 7(-2.435,-1.25) 8(-2.435,-1.75) 17(2.435,-1.75) 18(2.435,-1.25) 19(2.435,-0.75) 20(2.435,-0.25) 21(2.435,0.25) 22(2.435,0.75) 23(2.435,1.25) 24(2.435,1.75)
  rect 0.25x0.7 smd: 9(-1.75,-2.435) 10(-1.25,-2.435) 11(-0.75,-2.435) 12(-0.25,-2.435) 13(0.25,-2.435) 14(0.75,-2.435) 15(1.25,-2.435) 16(1.75,-2.435) 25(1.75,2.435) 26(1.25,2.435) 27(0.75,2.435) 28(0.25,2.435) 29(-0.25,2.435) 30(-0.75,2.435) 31(-1.25,2.435) 32(-1.75,2.435)
  rect 3.45x3.45 smd paste-3: 33(0,0)
  silkscreen extent -3.17,-2.5 2.5,2.5, body extent -2.5,-2.5 2.5,2.5, height 0.6
"48-HTQFP (7x7)" [mm]
  rect 1.6x0.3 smd mask+0.08: 1(-4.25,2.75) 2(-4.25,2.25) 3(-4.25,1.75) 4(-4.25,1.25) 5(-4.25,0.75) 6(-4.25,0.25) 7(-4.25,-0.25) 8(-4.25,-0.75) 9(-4.25,-1.25) 10(-4.25,-1.75) 11(-4.25,-2.25) 12(-4.25,-2.75) 25(4.25,-2.75) 26(4.25,-2.25) 27(4.25,-1.75) 28(4.25,-1.25) 29(4.25,-0.75) 30(4.25,-0.25) 31(4.25,0.25) 32(4.25,0.75) 33(4.25,1.25) 34(4.25,1.75) 35(4.25,2.25) 36(4.25,2.75)
  rect 0.3x1.6 smd mask+0.08: 13(-2.75,-4.25) 14(-2.25,-4.25) 15(-1.75,-4.25) 16(-1.25,-4.25) 17(-0.75,-4.25) 18(-0.25,-4.25) 19(0.25,-4.25) 20(0.75,-4.25) 21(1.25,-4.25) 22(1.75,-4.25) 23(2.25,-4.25) 24(2.75,-4.25) 37(2.75,4.25) 38(2.25,4.25) 39(1.75,4.25) 40(1.25,4.25) 41(0.75,4.25) 42(0.25,4.25) 43(-0.25,4.25) 44(-0.75,4.25) 45(-1.25,4.25) 46(-1.75,4.25) 47(-2.25,4.25) 48(-2.75,4.25)
  rect 5.5x5.5 smd mask+0.08: 49(0,0)
  silkscreen extent -5.38,-3.74 3.82,3.74, body extent -4.5,-4.5 4.5,4.5, height 1.2
5027740891 [mm]
  rect 0.8x1.68 smd: 1(-2.952,7.335) 2(-1.852,7.335) 3(-0.753,7.335) 4(0.347,7.335) 5(1.448,7.335) 6(2.548,7.335) 7(3.648,7.335) 8(4.748,7.335)
  rect 1.29x1.4 smd: DN(6.803,5.775) SN(6.803,-1.625)
  rect 1.5x1.7 smd: SH1(-6.802,-7.425) SH2(6.697,-7.425)
  rect 1.6x1.5 smd: SH3(6.148,7.425) SH4(-6.502,7.425)
  silkscreen extent -7.2,-8.05 7.1,6.95, body extent -7.3,-8.19 7,7.81, height 1.8
B8B-XH-A(LF)(SN) [mm]
  rect 1.8x1.8 hole 1: 1(-8.75,0)
  round 1.8 hole 1: 2(-6.25,0) 3(-3.75,0) 4(-1.25,0) 5(1.25,0) 6(3.75,0) 7(6.25,0) 8(8.75,0)
  silkscreen extent -11.2,-3.47 11.2,2.28, body extent -11.2,-3.47 11.2,2.28, height 7
Cap-0402 [mil]
  rect 18x25 smd mask+2.36: 1(-18.5,0) 2(18.5,0)
  silkscreen extent -31,-16 31,16, body extent -20,-10 20,10, height 19
Cap-0603 [mil]
  rect 30x35 smd mask+2.36: 1(-30,0) 2(30,0)
  silkscreen extent -49,-21 49,21, body extent -32,-16 31,16, height 34
Cap-0805 [mil] "SMD 0805"
  rect 40x60 smd mask+2.76: 1(-40,0) 2(40,0)
  silkscreen extent -64,-34 64,34, body extent -39,-25 39,25, height 30
Cap-1210 [mil] "SMD 1210"
  rect 60x110 smd: 1(-50,0) 2(50,0)
  silkscreen extent -84,-59 84,59, body extent -63,-49 63,49, height 39
Case-A [mm]
  rect 1.42x1.13 smd: 1(-1.2,0) 2(1.2,0)
  silkscreen extent -1.63,-0.97 1.63,0.97, body extent -1.6,-0.9 1.6,0.9, height 1.8
EC21EFA-512-STD [mm]
  rect 2.5x0.8 smd: 1(-15.75,12.6) 2(-15.75,11.3) 3(-15.75,10) 4(-15.75,8.7) 5(-15.75,7.4) 6(-15.75,6.1) 7(-15.75,4.8) 8(-15.75,0.4) 9(-15.75,-0.9) 10(-15.75,-2.2) 11(-15.75,-3.5) 12(-15.75,-4.8) 13(-15.75,-6.1) 14(-15.75,-7.4) 15(-15.75,-8.7) 16(-15.75,-10) 17(-15.75,-11.3) 18(-15.75,-12.6) 37(15.75,-12.6) 38(15.75,-11.3) 39(15.75,-10) 40(15.75,-8.7) 41(15.75,-7.4) 42(15.75,-6.1) 43(15.75,-4.8) 44(15.75,-3.5) 45(15.75,-2.2) 46(15.75,-0.9) 47(15.75,0.4) 48(15.75,4.8) 49(15.75,6.1) 50(15.75,7.4) 51(15.75,8.7) 52(15.75,10) 53(15.75,11.3) 54(15.75,12.6) 141(-15.75,3) 142(-15.75,1.7) 143(15.75,1.7) 144(15.75,3)
  rect 0.8x2.5 smd: 19(-9.55,-14.25) 20(-8.25,-14.25) 21(-6.95,-14.25) 22(-5.65,-14.25) 23(-4.35,-14.25) 24(-3.05,-14.25) 25(-1.75,-14.25) 26(-0.45,-14.25) 27(0.85,-14.25) 28(2.15,-14.25) 29(3.45,-14.25) 30(4.75,-14.25) 31(6.05,-14.25) 32(7.35,-14.25) 33(8.65,-14.25) 34(9.95,-14.25) 35(11.25,-14.25) 36(12.55,-14.25) 55(12.55,14.25) 56(11.25,14.25) 57(9.95,14.25) 58(8.65,14.25) 59(7.35,14.25) 60(6.05,14.25) 61(4.75,14.25) 62(3.45,14.25) 63(2.15,14.25) 64(0.85,14.25) 65(-0.45,14.25) 66(-1.75,14.25) 67(-3.05,14.25) 68(-4.35,14.25) 69(-5.65,14.25) 70(-6.95,14.25) 71(-8.25,14.25) 72(-9.55,14.25) 113(-10.85,14.25) 114(-12.15,14.25) 115(-10.85,-14.25) 116(-12.15,-14.25)
  rect 2x3 smd: 85(8.2,9.6) 86(8.2,4.8) 87(8.2,0) 88(8.2,-4.8) 89(8.2,-9.6) 90(5,9.6) 91(5,4.8) 92(5,0) 93(5,-4.8) 94(5,-9.6) 95(1.6,9.6) 96(1.6,4.8) 97(1.6,-4.8) 98(1.6,-9.6) 99(-1.6,9.6) 100(-1.6,4.8) 101(-1.6,-4.8) 102(-1.6,-9.6) 103(-5,9.6) 104(-5,4.8) 105(-5,0) 106(-5,-4.8) 107(-5,-9.6) 109(-8.2,4.8) 110(-8.2,0) 111(-8.2,-4.8) 112(-8.2,-9.6)
  rect 1x2 smd: 108(-8.2,9.6)
  rect 1.1x1.1 smd: 117(-11,11) 118(-11,9) 119(-11,7) 120(-11,5) 121(-11,3) 122(-11,1) 123(-11,-1) 124(-11,-3) 125(-11,-5) 126(-11,-7) 127(-11,-9) 128(-11,-11) 129(-13,11) 130(-13,9) 131(-13,7) 132(-13,5) 133(-13,3) 134(-13,1) 135(-13,-1) 136(-13,-3) 137(-13,-5) 138(-13,-7) 139(-13,-9) 140(-13,-11)
  Top Layer region: -7.2,8.1 -9.2,8.1 -9.2,10.6 -8.7,11.1 -7.2,11.1
  Keep-Out Layer region: 3.5,-2.8 -3.5,-2.8 -3.5,2.8 3.5,2.8
  silkscreen extent -17.46,-14.5 16,14.5, body extent -16,-14.5 16,14.5, height 2.6
ETQP3M6R8KVN [mm]
  rect 2.1x3.2 smd paste+0 mask+0.051: 1(-2.8,0) 2(2.8,0)
  silkscreen extent -3.2,-3 3.2,3, body extent -3.2,-3 3.2,3.01, height 3
FH34SRJ-40S-0.5SH(50) [mm]
  rect 0.3x1 smd: 1(9.75,1.25) 2(9.25,1.25) 3(8.75,1.25) 4(8.25,1.25) 5(7.75,1.25) 6(7.25,1.25) 7(6.75,1.25) 8(6.25,1.25) 9(5.75,1.25) 10(5.25,1.25) 11(4.75,1.25) 12(4.25,1.25) 13(3.75,1.25) 14(3.25,1.25) 15(2.75,1.25) 16(2.25,1.25) 17(1.75,1.25) 18(1.25,1.25) 19(0.75,1.25) 20(0.25,1.25) 21(-0.25,1.25) 22(-0.75,1.25) 23(-1.25,1.25) 24(-1.75,1.25) 25(-2.25,1.25) 26(-2.75,1.25) 27(-3.25,1.25) 28(-3.75,1.25) 29(-4.25,1.25) 30(-4.75,1.25) 31(-5.25,1.25) 32(-5.75,1.25) 33(-6.25,1.25) 34(-6.75,1.25) 35(-7.25,1.25) 36(-7.75,1.25) 37(-8.25,1.25) 38(-8.75,1.25) 39(-9.25,1.25) 40(-9.75,1.25)
  rect 0.8x1 smd: S1(-10.75,-1.25) S2(10.75,-1.25)
  silkscreen extent -11.01,-1.87 11,2.41, body extent -11,-1.77 11,1.43, height 1.76
FSM6JSMATR [mm]
  rect 2.1x1.4 smd: 1(-4.55,-2.25) 1(-4.55,2.25) 2(4.55,-2.25) 2(4.55,2.25)
  silkscreen extent -5.91,-3 3,3, body extent -5,-3 5,3, height 7.26
FUET-5025 [mm]
  rect 1.8x1 smd: 1(-1.75,-1.75) 2(1.75,-1.75)
  rect 2x1 smd: 3(-1.75,1.75)
  silkscreen extent -2.5,-2.5 2.5,2.5, body extent -2.5,-2.5 2.5,2.51, height 2.51
"HX0.5-10P XJH2.0 043" [mm]
  rect 0.25x1.5 smd paste+0 mask+0.051: 1(2.25,1.3) 2(1.75,1.3) 3(1.25,1.3) 4(0.75,1.3) 5(0.25,1.3) 6(-0.25,1.3) 7(-0.75,1.3) 8(-1.25,1.3) 9(-1.75,1.3) 10(-2.25,1.3)
  rect 2x1.7 smd paste+0 mask+0.051: MP1(-3.95,-1.3) MP2(3.95,-1.3)
  silkscreen extent -4.74,-4.36 4.74,0.85, body extent -4.71,-4.4 4.7,1.6, height 2.02
"IND-0603 (1608 Metric)" [mm] "0.063\" L x 0.032\" W (1.60mm x 0.80mm)"
  rect 0.6x0.8 smd: 1(-0.7,0) 2(0.7,0)
  silkscreen extent -0.2,-0.46 0.23,0.46, body extent -0.8,-0.4 0.8,0.4, height 0.78
LED-0603 [mm]
  rect 0.5x1 smd: 1(-0.75,0) 2(0.75,0)
  silkscreen extent -1.12,-0.66 1.75,0.66, body extent -0.82,-0.37 0.82,0.36, height 0.68
LQFP-128-EP(14x14) [mm]
  rect 1.5x0.2 smd mask+0.07: 1(-7.6,6.2) 2(-7.6,5.8) 3(-7.6,5.4) 4(-7.6,5) 5(-7.6,4.6) 6(-7.6,4.2) 7(-7.6,3.8) 8(-7.6,3.4) 9(-7.6,3) 10(-7.6,2.6) 11(-7.6,2.2) 12(-7.6,1.8) 13(-7.6,1.4) 14(-7.6,1) 15(-7.6,0.6) 16(-7.6,0.2) 17(-7.6,-0.2) 18(-7.6,-0.6) 19(-7.6,-1) 20(-7.6,-1.4) 21(-7.6,-1.8) 22(-7.6,-2.2) 23(-7.6,-2.6) 24(-7.6,-3) 25(-7.6,-3.4) 26(-7.6,-3.8) 27(-7.6,-4.2) 28(-7.6,-4.6) 29(-7.6,-5) 30(-7.6,-5.4) 31(-7.6,-5.8) 32(-7.6,-6.2) 65(7.6,-6.2) 66(7.6,-5.8) 67(7.6,-5.4) 68(7.6,-5) 69(7.6,-4.6) 70(7.6,-4.2) 71(7.6,-3.8) 72(7.6,-3.4) 73(7.6,-3) 74(7.6,-2.6) 75(7.6,-2.2) 76(7.6,-1.8) 77(7.6,-1.4) 78(7.6,-1) 79(7.6,-0.6) 80(7.6,-0.2) 81(7.6,0.2) 82(7.6,0.6) 83(7.6,1) 84(7.6,1.4) 85(7.6,1.8) 86(7.6,2.2) 87(7.6,2.6) 88(7.6,3) 89(7.6,3.4) 90(7.6,3.8) 91(7.6,4.2) 92(7.6,4.6) 93(7.6,5) 94(7.6,5.4) 95(7.6,5.8) 96(7.6,6.2)
  rect 0.2x1.5 smd mask+0.07: 33(-6.2,-7.6) 34(-5.8,-7.6) 35(-5.4,-7.6) 36(-5,-7.6) 37(-4.6,-7.6) 38(-4.2,-7.6) 39(-3.8,-7.6) 40(-3.4,-7.6) 41(-3,-7.6) 42(-2.6,-7.6) 43(-2.2,-7.6) 44(-1.8,-7.6) 45(-1.4,-7.6) 46(-1,-7.6) 47(-0.6,-7.6) 48(-0.2,-7.6) 49(0.2,-7.6) 50(0.6,-7.6) 51(1,-7.6) 52(1.4,-7.6) 53(1.8,-7.6) 54(2.2,-7.6) 55(2.6,-7.6) 56(3,-7.6) 57(3.4,-7.6) 58(3.8,-7.6) 59(4.2,-7.6) 60(4.6,-7.6) 61(5,-7.6) 62(5.4,-7.6) 63(5.8,-7.6) 64(6.2,-7.6) 97(6.2,7.6) 98(5.8,7.6) 99(5.4,7.6) 100(5,7.6) 101(4.6,7.6) 102(4.2,7.6) 103(3.8,7.6) 104(3.4,7.6) 105(3,7.6) 106(2.6,7.6) 107(2.2,7.6) 108(1.8,7.6) 109(1.4,7.6) 110(1,7.6) 111(0.6,7.6) 112(0.2,7.6) 113(-0.2,7.6) 114(-0.6,7.6) 115(-1,7.6) 116(-1.4,7.6) 117(-1.8,7.6) 118(-2.2,7.6) 119(-2.6,7.6) 120(-3,7.6) 121(-3.4,7.6) 122(-3.8,7.6) 123(-4.2,7.6) 124(-4.6,7.6) 125(-5,7.6) 126(-5.4,7.6) 127(-5.8,7.6) 128(-6.2,7.6)
  rect 5x5 smd mask+0.07: 129(0,0)
  silkscreen extent -8.64,-6.25 6.25,6.33, body extent -8,-8 8,8, height 1.61
Res-0402 [mil]
  rect 18x25 smd mask+2.17: 1(-18.5,0) 2(18.5,0)
  silkscreen extent -32,-17 32,16, body extent -23,-11 23,11, height 16
Res-0603 [mil]
  rect 30x35 smd: 1(-30,0) 2(30,0)
  silkscreen extent -48,-21 48,21, body extent -31,-17 31,17, height 18
"SC EB 5R5 474 M" [mm]
  rect 1.2x2.2 hole 0.6 square: 1(-2.5,0) 2(2.5,0)
  silkscreen extent -6.75,-6.75 6.75,6.75, body extent -6.75,-6.75 6.75,6.75, height 7
SMD3215-2P [mm]
  rect 1x1.8 smd: 1(-1.25,0) 2(1.25,0)
  silkscreen extent -0.56,-0.81 0.56,0.81, body extent -1.6,-0.75 1.6,0.75, height 0.8
SMD3225-4P [mm]
  rect 1.4x1.2 smd: 1(-1.1,-0.85) 2(1.1,-0.85) 3(1.1,0.85) 4(-1.1,0.85)
  silkscreen extent -2.08,-1.3 1.65,1.3, body extent -1.6,-1.25 1.6,1.25, height 0.81
SMD5032-4P [mm]
  rect 2x1.4 smd: 1(-2.05,-1.2) 2(2.05,-1.2) 3(2.05,1.2) 4(-2.05,1.2)
  silkscreen extent -3.35,-1.65 2.54,1.65, body extent -2.5,-1.6 2.5,1.6, height 1.12
SMNR4030-4R7MT [mm]
  rect 1.4x4.5 smd paste+0 mask+0.051: 1(-1.6,0) 2(1.6,0)
  silkscreen extent -0.8,-2 0.8,2.05, body extent -2,-2 2,2, height 3.02
SOD-123 [mm]
  rect 0.95x0.9 smd: 1(-1.575,0) 2(1.575,0)
  silkscreen extent -1.37,-0.8 2.82,0.8, body extent -1.82,-0.78 1.83,0.78, height 1.5
"SOD-523 (Bi-Directional)" [mm]
  rect 0.6x0.4 smd: 1(-0.75,0) 2(0.75,0)
  silkscreen extent -0.65,-0.5 0.65,0.5, body extent -0.8,-0.4 0.8,0.4, height 0.7
SOD-523F [mm]
  rect 0.8x0.52 smd: 1(-1,0) 2(1,0)
  silkscreen extent -0.64,-0.51 1.78,0.51, body extent -0.8,-0.4 0.8,0.4, height 0.7
"SOIC-8(0.154\", 3.90mm Width)" [mm]
  rect 1.55x0.6 smd: 1(-2.7,1.905) 2(-2.7,0.635) 3(-2.7,-0.635) 4(-2.7,-1.905) 5(2.7,-1.905) 6(2.7,-0.635) 7(2.7,0.635) 8(2.7,1.905)
  silkscreen extent -3.79,-2.51 1.8,2.51, body extent -3.01,-2.45 3.01,2.45, height 1.63
SOP-16 [mil]
  rect 57.55x22 smd: 1(-107.27,175) 2(-107.27,125) 3(-107.27,75) 4(-107.27,25) 5(-107.27,-25) 6(-107.27,-75) 7(-107.27,-125) 8(-107.27,-175) 9(107.27,-175) 10(107.27,-125) 11(107.27,-75) 12(107.27,-25) 13(107.27,25) 14(107.27,75) 15(107.27,125) 16(107.27,175)
  silkscreen extent -149,-199 84,199, body extent -122,-197 122,197, height 69
SOT-23 [mm] "TRANS NPN 40V 0.6A SOT23"
  rect 0.82x0.92 smd: 1(-0.95,-1) 2(0.95,-1) 3(0,1)
  silkscreen extent -1.68,-1.3 1.55,0.81, body extent -1.5,-1.25 1.5,1.25, height 1.05
SOT-223-6_ [mm]
  rect 0.55x2.15 smd: 1(-2.54,-3.1) 2(-1.27,-3.1) 3(0,-3.1) 4(1.27,-3.1) 5(2.54,-3.1)
  rect 3.5x2.2 smd: 6(0,3.1)
  silkscreen extent -3.33,-4.51 3.33,1.84, body extent -3.27,-3.63 3.27,3.63, height 1.8
SOT-416 [mm]
  rect 0.46x0.65 smd: 1(0.5,-0.525) 2(-0.5,-0.525) 3(0,0.525)
  silkscreen extent -0.81,-0.65 1.03,0.41, body extent -0.8,-0.8 0.8,0.8, height 0.75
SOT-563 [mm]
  rect 0.67x0.3 smd mask+0.07: 1(-0.638,0.5) 2(-0.638,0) 3(-0.638,-0.5) 4(0.638,-0.5) 5(0.638,0) 6(0.638,0.5)
  silkscreen extent -1.22,-0.9 0.74,0.9, body extent -0.85,-0.85 0.85,0.85, height 0.61
SOT-583 [mm]
  rect 0.67x0.32 smd mask+0.055: 1(-0.735,0.75) 2(-0.735,0.25) 3(-0.735,-0.25) 4(-0.735,-0.75) 5(0.735,-0.75) 6(0.735,-0.25) 7(0.735,0.25) 8(0.735,0.75)
  silkscreen extent -1.32,-1.1 0.6,1.1, body extent -0.8,-1.05 0.8,1.05, height 0.6
SRN4018-4R7M [mm]
  rect 1.4x4.2 smd paste+0 mask+0.05: 1(-1.4,0) 2(1.4,0)
  silkscreen extent -0.48,-2.1 0.45,2.1, body extent -2,-2.02 2,2.02, height 1.83
"Test-point - 0.5mm"#1 [mm]
  oct 1x1 smd: 1(0,0)
  silkscreen extent -0.68,-0.68 0.68,0.68
"Test-point - 0.5mm"#2 [mm]
  round 0.75 smd: 1(0,0)
"TH LED 5mm Green" [mm]
  rect 1.6x1.6 hole 0.9: 1(-1.27,0)
  round 1.6 hole 0.9: 2(1.27,0)
  silkscreen extent -2.47,-3 3,3, body extent -2.5,-3 3,3, height 9.44
"TH LED 5mm Yellow" [mm]
  rect 1.6x1.6 hole 0.9: 1(-1.27,0)
  round 1.6 hole 0.9: 2(1.27,0)
  silkscreen extent -2.47,-3 3,3, body extent -2.5,-3 3,3, height 9.44
"TH LED 5mm_" [mm]
  rect 1.6x1.6 hole 0.9: 1(-1.27,0)
  round 1.6 hole 0.9: 2(1.27,0)
  silkscreen extent -2.47,-3 3,3, body extent -2.5,-3 3,3, height 9.44
TS-1002S-12026C [mm]
  rect 2.3x1.5 smd: 1(-4.55,2.25) 2(4.55,2.25) 3(-4.55,-2.25) 4(4.55,-2.25)
  silkscreen extent -3,-3 3,3
TS-1088-AR02016 [mm]
  rect 1.23x1.36 smd: 1(-2.185,0) 2(2.185,0)
  silkscreen extent -2.03,-1.54 2.03,1.54, body extent -2.4,-1.45 2.4,1.45, height 1.95
TSSOP-20 [mm]
  rect 1.6x0.32 smd: 1(-2.8,2.925) 2(-2.8,2.275) 3(-2.8,1.625) 4(-2.8,0.975) 5(-2.8,0.325) 6(-2.8,-0.325) 7(-2.8,-0.975) 8(-2.8,-1.625) 9(-2.8,-2.275) 10(-2.8,-2.925) 11(2.8,-2.925) 12(2.8,-2.275) 13(2.8,-1.625) 14(2.8,-0.975) 15(2.8,-0.325) 16(2.8,0.325) 17(2.8,0.975) 18(2.8,1.625) 19(2.8,2.275) 20(2.8,2.925)
  silkscreen extent -3.88,-3.3 1.95,3.3, body extent -3.2,-3.25 3.2,3.25, height 1.2
U-D-M5DD-Y-3 [mm]
  round 1 hole 0.5: 1(-1.3,0.445) 2(-0.65,-0.555) 3(0,0.445) 4(0.65,-0.555) 5(1.3,0.445)
  oval 1x2 hole 0.5 slot 1.8 at 90 deg: SH1(-3.575,0.555) SH2(3.575,0.555)
  silkscreen extent -3.5,-1.74 3.56,2.29, body extent -4,-1.76 4,2.24, height 6.58
U.FL-R-SMT(10) [mm]
  rect 1.05x1 smd: 1(-0.763,0)
  rect 2.2x1.05 smd: 2(0.763,1.475) 3(0.763,-1.475)
  silkscreen extent -0.66,-1.3 2.18,1.3, body extent -0.79,-1.5 2.31,1.5, height 1.25
WSON-6-EP(2x2) [mm]
  rect 0.45x0.4 smd paste+0 mask+0.051: 1(-0.975,0.65) 2(-0.975,0) 3(-0.975,-0.65) 4(0.975,-0.65) 5(0.975,0) 6(0.975,0.65)
  rect 1x1.6 smd paste+0 mask+0.051: 7(0,0)
  silkscreen extent -1.47,-1.05 1.05,1.05, body extent -1.01,-1 1.01,1, height 0.81
WSON-8-EP(6x8) [mm]
  rect 1.2x0.6 smd: 1(-3.8,1.905) 2(-3.8,0.635) 3(-3.8,-0.635) 4(-3.8,-1.905) 5(3.8,-1.905) 6(3.8,-0.635) 7(3.8,0.635) 8(3.8,1.905)
  rect 3.4x4.3 smd: 9(0,0)
  silkscreen extent -4.72,-3 4,3, body extent -4,-3 4,3, height 0.8
YNR4018-220M [mm]
  rect 1.6x3.5 smd paste+0 mask+0.051: 1(-1.6,0) 2(1.6,0)
  silkscreen extent -2.08,-2.07 2.08,2.07, body extent -2.01,-2 2.01,2, height 1.87

## Part data
C1 C2 C5 C6: library part GJM1555C1H150FB01D, "CAP CER 15PF 50V C0G/NP0 0402", LCSC Part Number=C441742, Manufacturer=Murata, Temperature Coefficient=30ppm/°C, ComponentLink1Description=https://datasheet.ciiva.com/11608/c02e-11608383.pdf?src-supplier=Avnet, ComponentLink1URL=https://datasheet.ciiva.com/11608/c02e-11608383.pdf?src-supplier=Avnet, Item Type=Capacitors, Manufacturer Part Number=GJM1555C1H150FB01D, Material=4241ConductorMaterial, Pricing="1=0.15, 10=0.054, 50=0.054, 100=0.035, 1000=0.03, 10000=0.023 (USD)", RoHS=Yes, Stock=44169, Supplier=Mouser
C3 C17 C22 C23 C34 C38 C42 C45 C87 C88: library part GRM155R70J105KA12J, "CAP CER 1UF 6.3V X7R 0402", Case Code (Imperial)=0402, Case Code (Metric)=1005, Dielectric=X7R, LCSC Part Number=C2167130, Manufacturer=Murata, Max Operating Temperature=125°C, Min Operating Temperature=-55°C, Package Quantity=50000, Tolerance=10%, Voltage Rating=6.3V, Case/Package=0402, ComponentLink1Description=http://www.mouser.com/ds/2/281/c02e-2905.pdf?src-supplier=Mouser, ComponentLink1URL=http://www.mouser.com/ds/2/281/c02e-2905.pdf?src-supplier=Mouser, ComponentLink2Description=https://datasheet.octopart.com/GRM155R70J105KA12J-Murata-datasheet-32479577.pdf?src-supplier=Future+Electronics, ComponentLink2URL=https://datasheet.octopart.com/GRM155R70J105KA12J-Murata-datasheet-32479577.pdf?src-supplier=Future+Electronics, ComponentLink3Description=https://datasheet.octopart.com/GRM155R70J105KA12J-Murata-datasheet-155345054.pdf?src-supplier=Element14, ComponentLink3URL=https://datasheet.octopart.com/GRM155R70J105KA12J-Murata-datasheet-155345054.pdf?src-supplier=Element14, ComponentLink4Description=http://search.murata.co.jp/Ceramy/image/img/A01X/G101/ENG/GRM155R70J105KA12-01.pdf?src-supplier=Digikey, ComponentLink4URL=http://search.murata.co.jp/Ceramy/image/img/A01X/G101/ENG/GRM155R70J105KA12-01.pdf?src-supplier=Digikey, ComponentLink5Description=https://datasheet.octopart.com/GRM155R70J105KA12J-Murata-datasheet-165579666.pdf?src-supplier=TME, ComponentLink5URL=https://datasheet.octopart.com/GRM155R70J105KA12J-Murata-datasheet-165579666.pdf?src-supplier=TME, Height=550um, Item Type=Capacitors, Length=0.039inch, Manufacturer Part Number=GRM155R70J105KA12J, Material=4241ConductorMaterial, Mounting Technology="Surface Mount", Packaging="Tape and Reel", Pins=2NUMBER, Pricing="1=0.1, 10=0.01, 50=0.01, 100=0.008, 1000=0.008, 10000=0.007 (USD)", RoHS=Yes, RoHS Compliant=Yes, Series=GRM, Stock=273640, Supplier=Mouser, Termination=SMD/SMT, Thickness=0.022inch, Voltage Rating (DC)=6.3V, Weight=0.000212oz, Width=0.02inch
C4 C11 C16 C20 C33 C37 C41 C57 C58 C93 C94 C149: library part GRM188Z71A106KA73D, "CAP CER 10UF 10V X7R 0603", Case/Package=345Case, LCSC Part Number=C2959727, Manufacturer=Murata, Max Operating Temperature=125°C, Min Operating Temperature=-55°C, Tolerance=10%, Voltage Rating=10V, ComponentLink1Description=https://datasheet.octopart.com/GRM188Z71A106KA73D-Murata-datasheet-165579666.pdf?src-supplier=TME, ComponentLink1URL=https://datasheet.octopart.com/GRM188Z71A106KA73D-Murata-datasheet-165579666.pdf?src-supplier=TME, Height=1mm, Item Type=Capacitor, Length=1.6mm, Manufacturer Part Number=GRM188Z71A106KA73D, Material=4241ConductorMaterial, Pricing="1=0.36, 10=0.155, 50=0.155, 100=0.104, 1000=0.094, 10000=0.065 (USD)", RoHS=Yes, RoHS Compliant=Yes, Stock=390983, Supplier=Mouser, Thickness=800um, Width=800um
C7 C12 C13 C14 C15 C18 C19 C24 C27 C28 C29 C30 C31 C35 C36 C39 C40 C43 C44 C46 C95 C97 C111 C114 C117 C120 C124 C127 C130 C133: library part GRM155R71E104KE14D, "CAP CER 0.1UF 25V X7R 0402", Case Code (Imperial)=0402, Case Code (Metric)=1005, Dielectric=X7R, Dielectric Material=Ceramic, LCSC Part Number=C77014, Manufacturer=Murata, Max Operating Temperature=125°C, Min Operating Temperature=-55°C, Package Quantity=10000, Tolerance=10%, Voltage=25V, Case/Package=0402, ComponentLink1Description=http://www.farnell.com/datasheets/1872206.pdf?src-supplier=Farnell, ComponentLink1URL=http://www.farnell.com/datasheets/1872206.pdf?src-supplier=Farnell, ComponentLink2Description=http://www.mouser.com/ds/2/281/c02e-2905.pdf?src-supplier=Mouser, ComponentLink2URL=http://www.mouser.com/ds/2/281/c02e-2905.pdf?src-supplier=Mouser, ComponentLink3Description=http://uk.rs-online.com/webdocs/144c/0900766b8144c113.pdf?src-supplier=Rs, ComponentLink3URL=http://uk.rs-online.com/webdocs/144c/0900766b8144c113.pdf?src-supplier=Rs, ComponentLink4Description=https://datasheet.octopart.com/GRM155R71E104KE14D-Murata-datasheet-62346597.pdf?src-supplier=Future+Electronics, ComponentLink4URL=https://datasheet.octopart.com/GRM155R71E104KE14D-Murata-datasheet-62346597.pdf?src-supplier=Future+Electronics, ComponentLink5Description=https://search.murata.co.jp/Ceramy/image/img/A01X/G101/ENG/GRM155R71E104KE14-01.pdf?src-supplier=Digikey, ComponentLink5URL=https://search.murata.co.jp/Ceramy/image/img/A01X/G101/ENG/GRM155R71E104KE14-01.pdf?src-supplier=Digikey, ComponentLink6Description=http://www.farnell.com/datasheets/2048008.pdf?src-supplier=Newark, ComponentLink6URL=http://www.farnell.com/datasheets/2048008.pdf?src-supplier=Newark, ComponentLink7Description=https://datasheet.octopart.com/GRM155R71E104KE14D-Murata-datasheet-62317124.pdf?src-supplier=Element14, ComponentLink7URL=https://datasheet.octopart.com/GRM155R71E104KE14D-Murata-datasheet-62317124.pdf?src-supplier=Element14, ComponentLink8Description=http://psearch.en.murata.com/capacitor/product/GRM155R71E104KE14%23.pdf?src-supplier=Avnet, ComponentLink8URL=http://psearch.en.murata.com/capacitor/product/GRM155R71E104KE14%23.pdf?src-supplier=Avnet, Depth=0.5mm, Height=0.5mm, Item Type=Capacitors, Lead Free=5697LeadFree, Length=1mm, Manufacturer Part Number=GRM155R71E104KE14D, Material=4241ConductorMaterial, Mounting Technology="Surface Mount", Packaging="Tape and Reel", Pins=2NUMBER, Pricing="1=0.1, 10=0.007, 50=0.007, 100=0.005, 1000=0.005, 10000=0.004 (USD)", Reach SVHC Compliant=Unknown, RoHS=Yes, RoHS Compliant=Yes, Series=GRM, Stock=652368, Supplier=Mouser, Termination=SMD/SMT, Thickness=0.022inch, Voltage Rating=25V, Voltage Rating (DC)=25V, Weight=0.000212oz, Width=0.02inch
C8: library part "SC EB 5R5 474 M", "0.47F -20%~+80% 5.5V", LCSC Part Number=C239004, Manufacturer=Wincap(Xingkai), Package=Custom, ComponentLink1Description=LCSC, ComponentLink1URL=https://item.szlcsc.com/238113.html, Item Type="Super Capaciitor", Manufacturer Part Number="SC EB 5R5 474 M"